# Altium PCB Stepper Board-v1.0.PcbDoc (part 1 of 8)
Units mil, origin at the board's own origin, x right, y up, seen from the top; angles counter-clockwise.
Board outline 6225.19 x 6531 mil, 4 copper layers (Top Layer, Layer-1, Layer-2, Bottom Layer), stack 61.654 mil thick; 410 components, 372 nets, 1464 pads, 1083 vias.
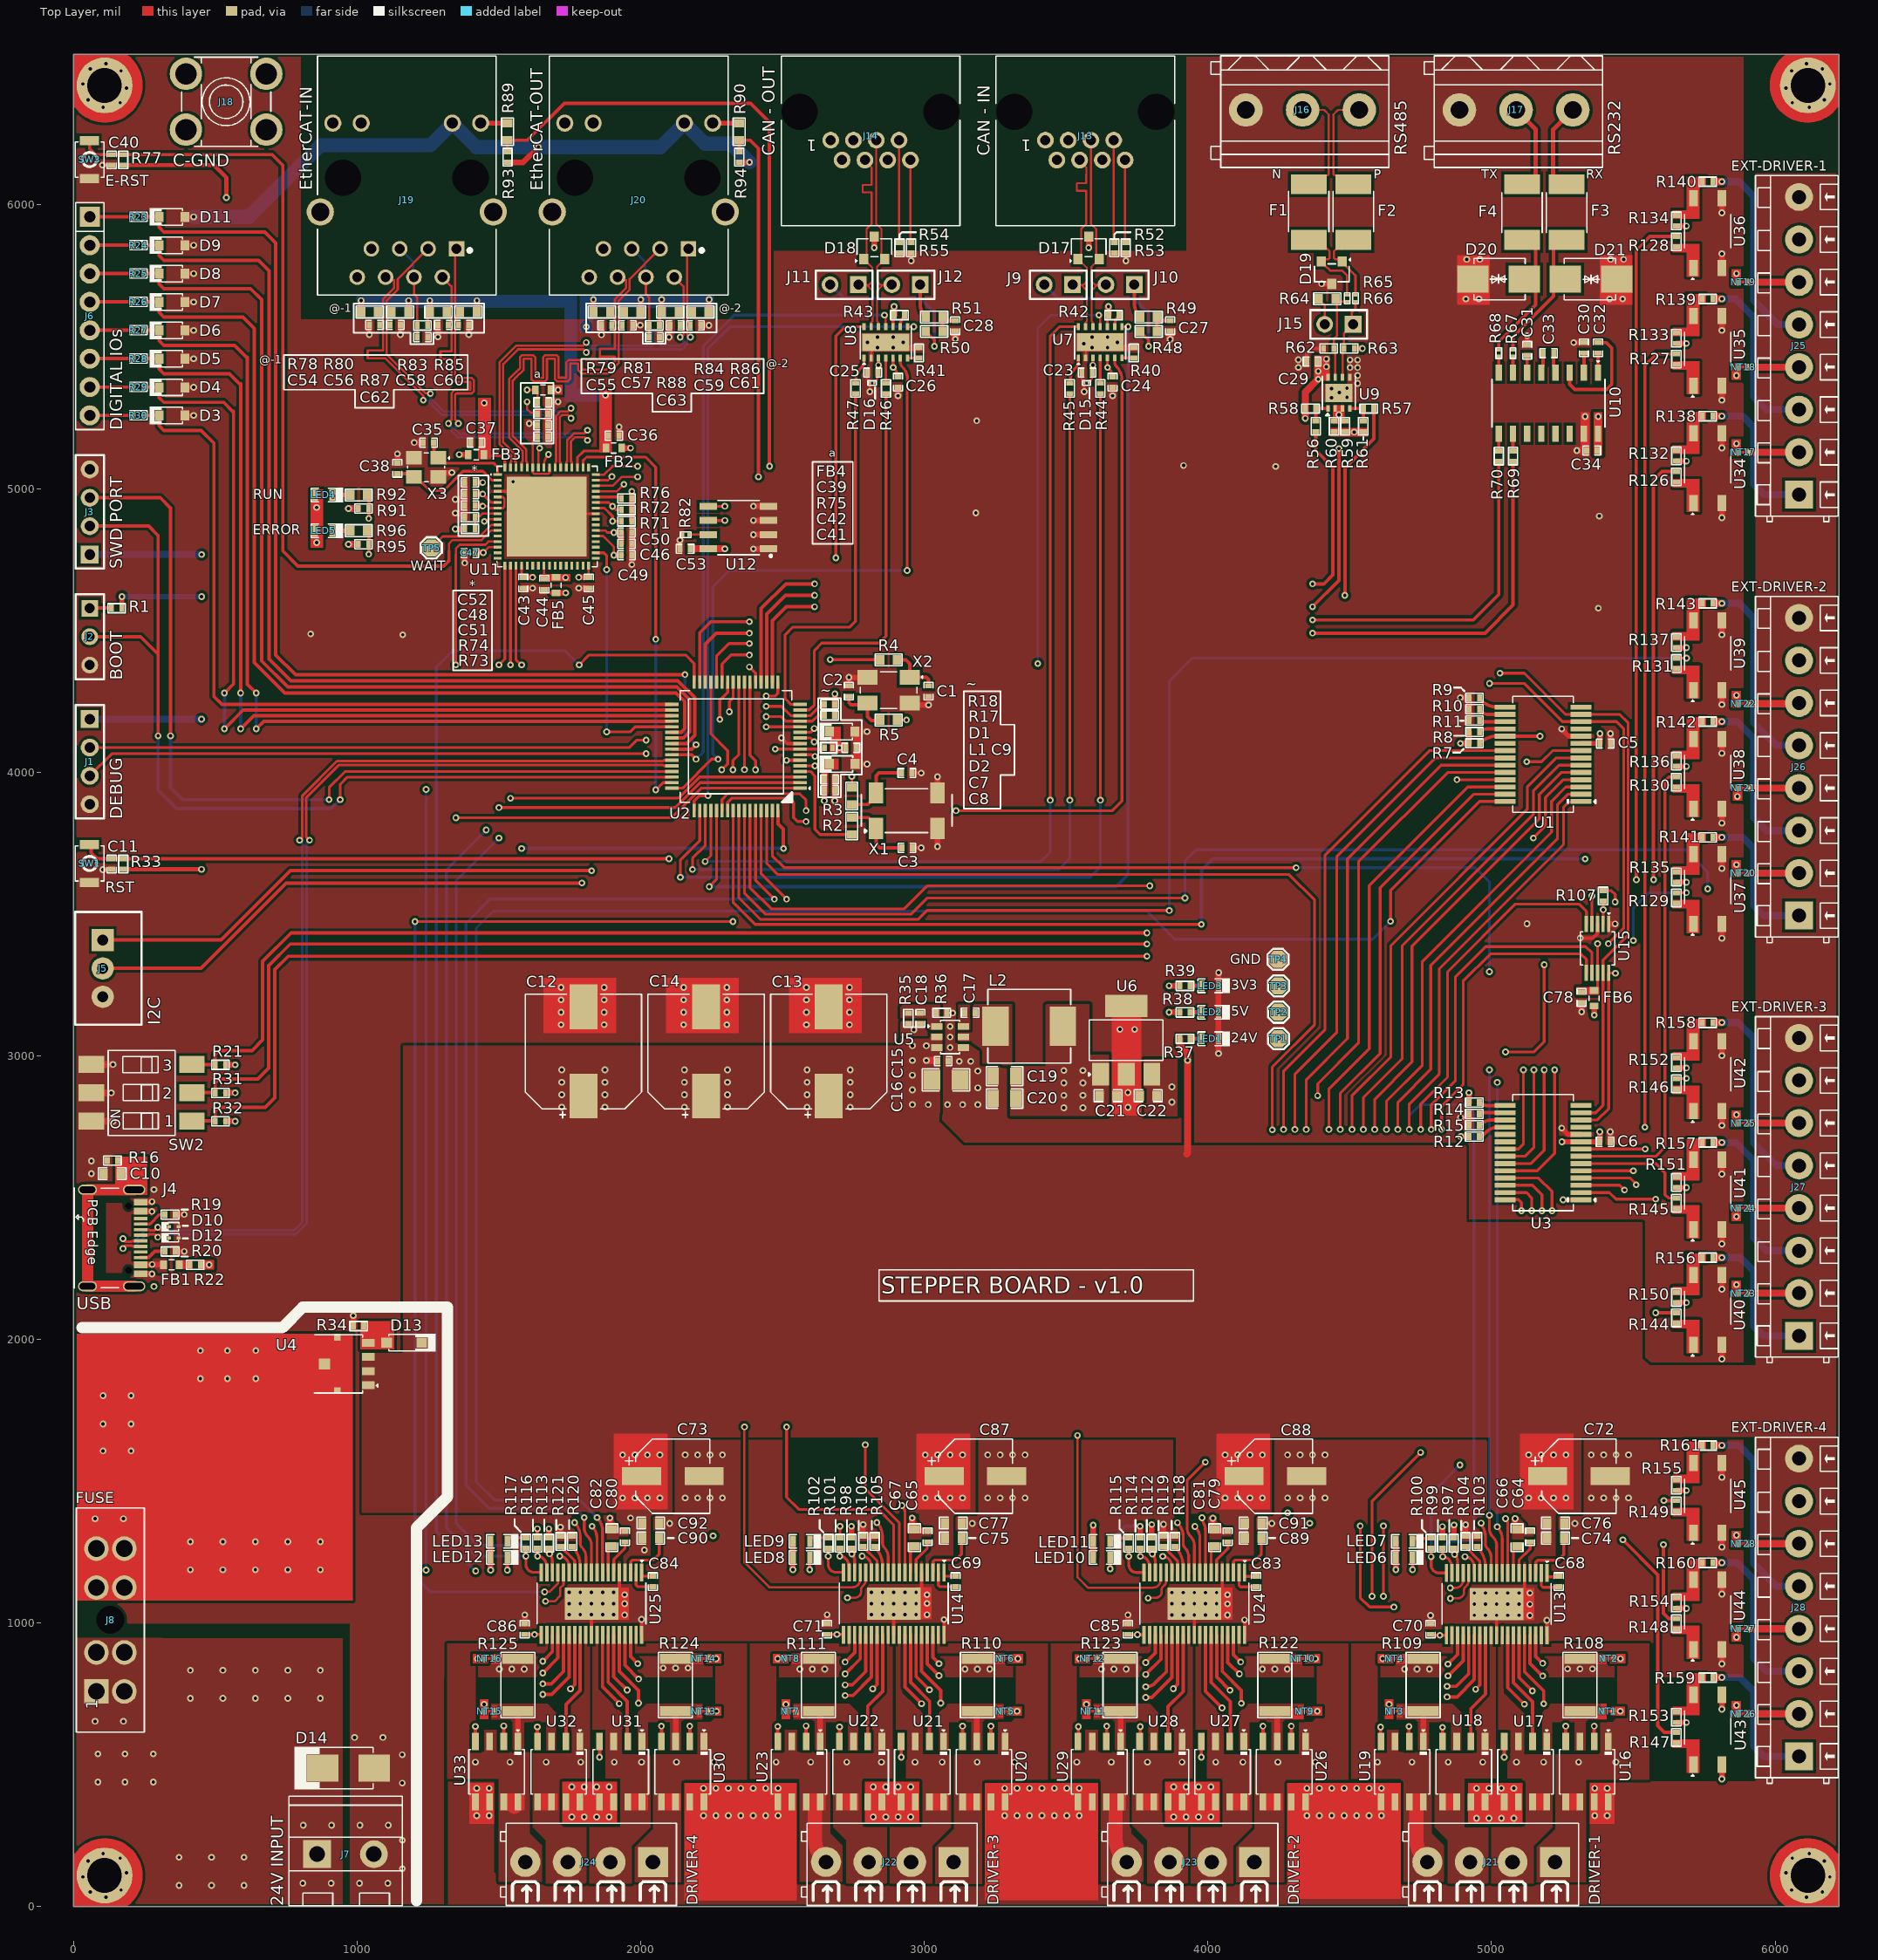
[diagram p0: Top Layer view]
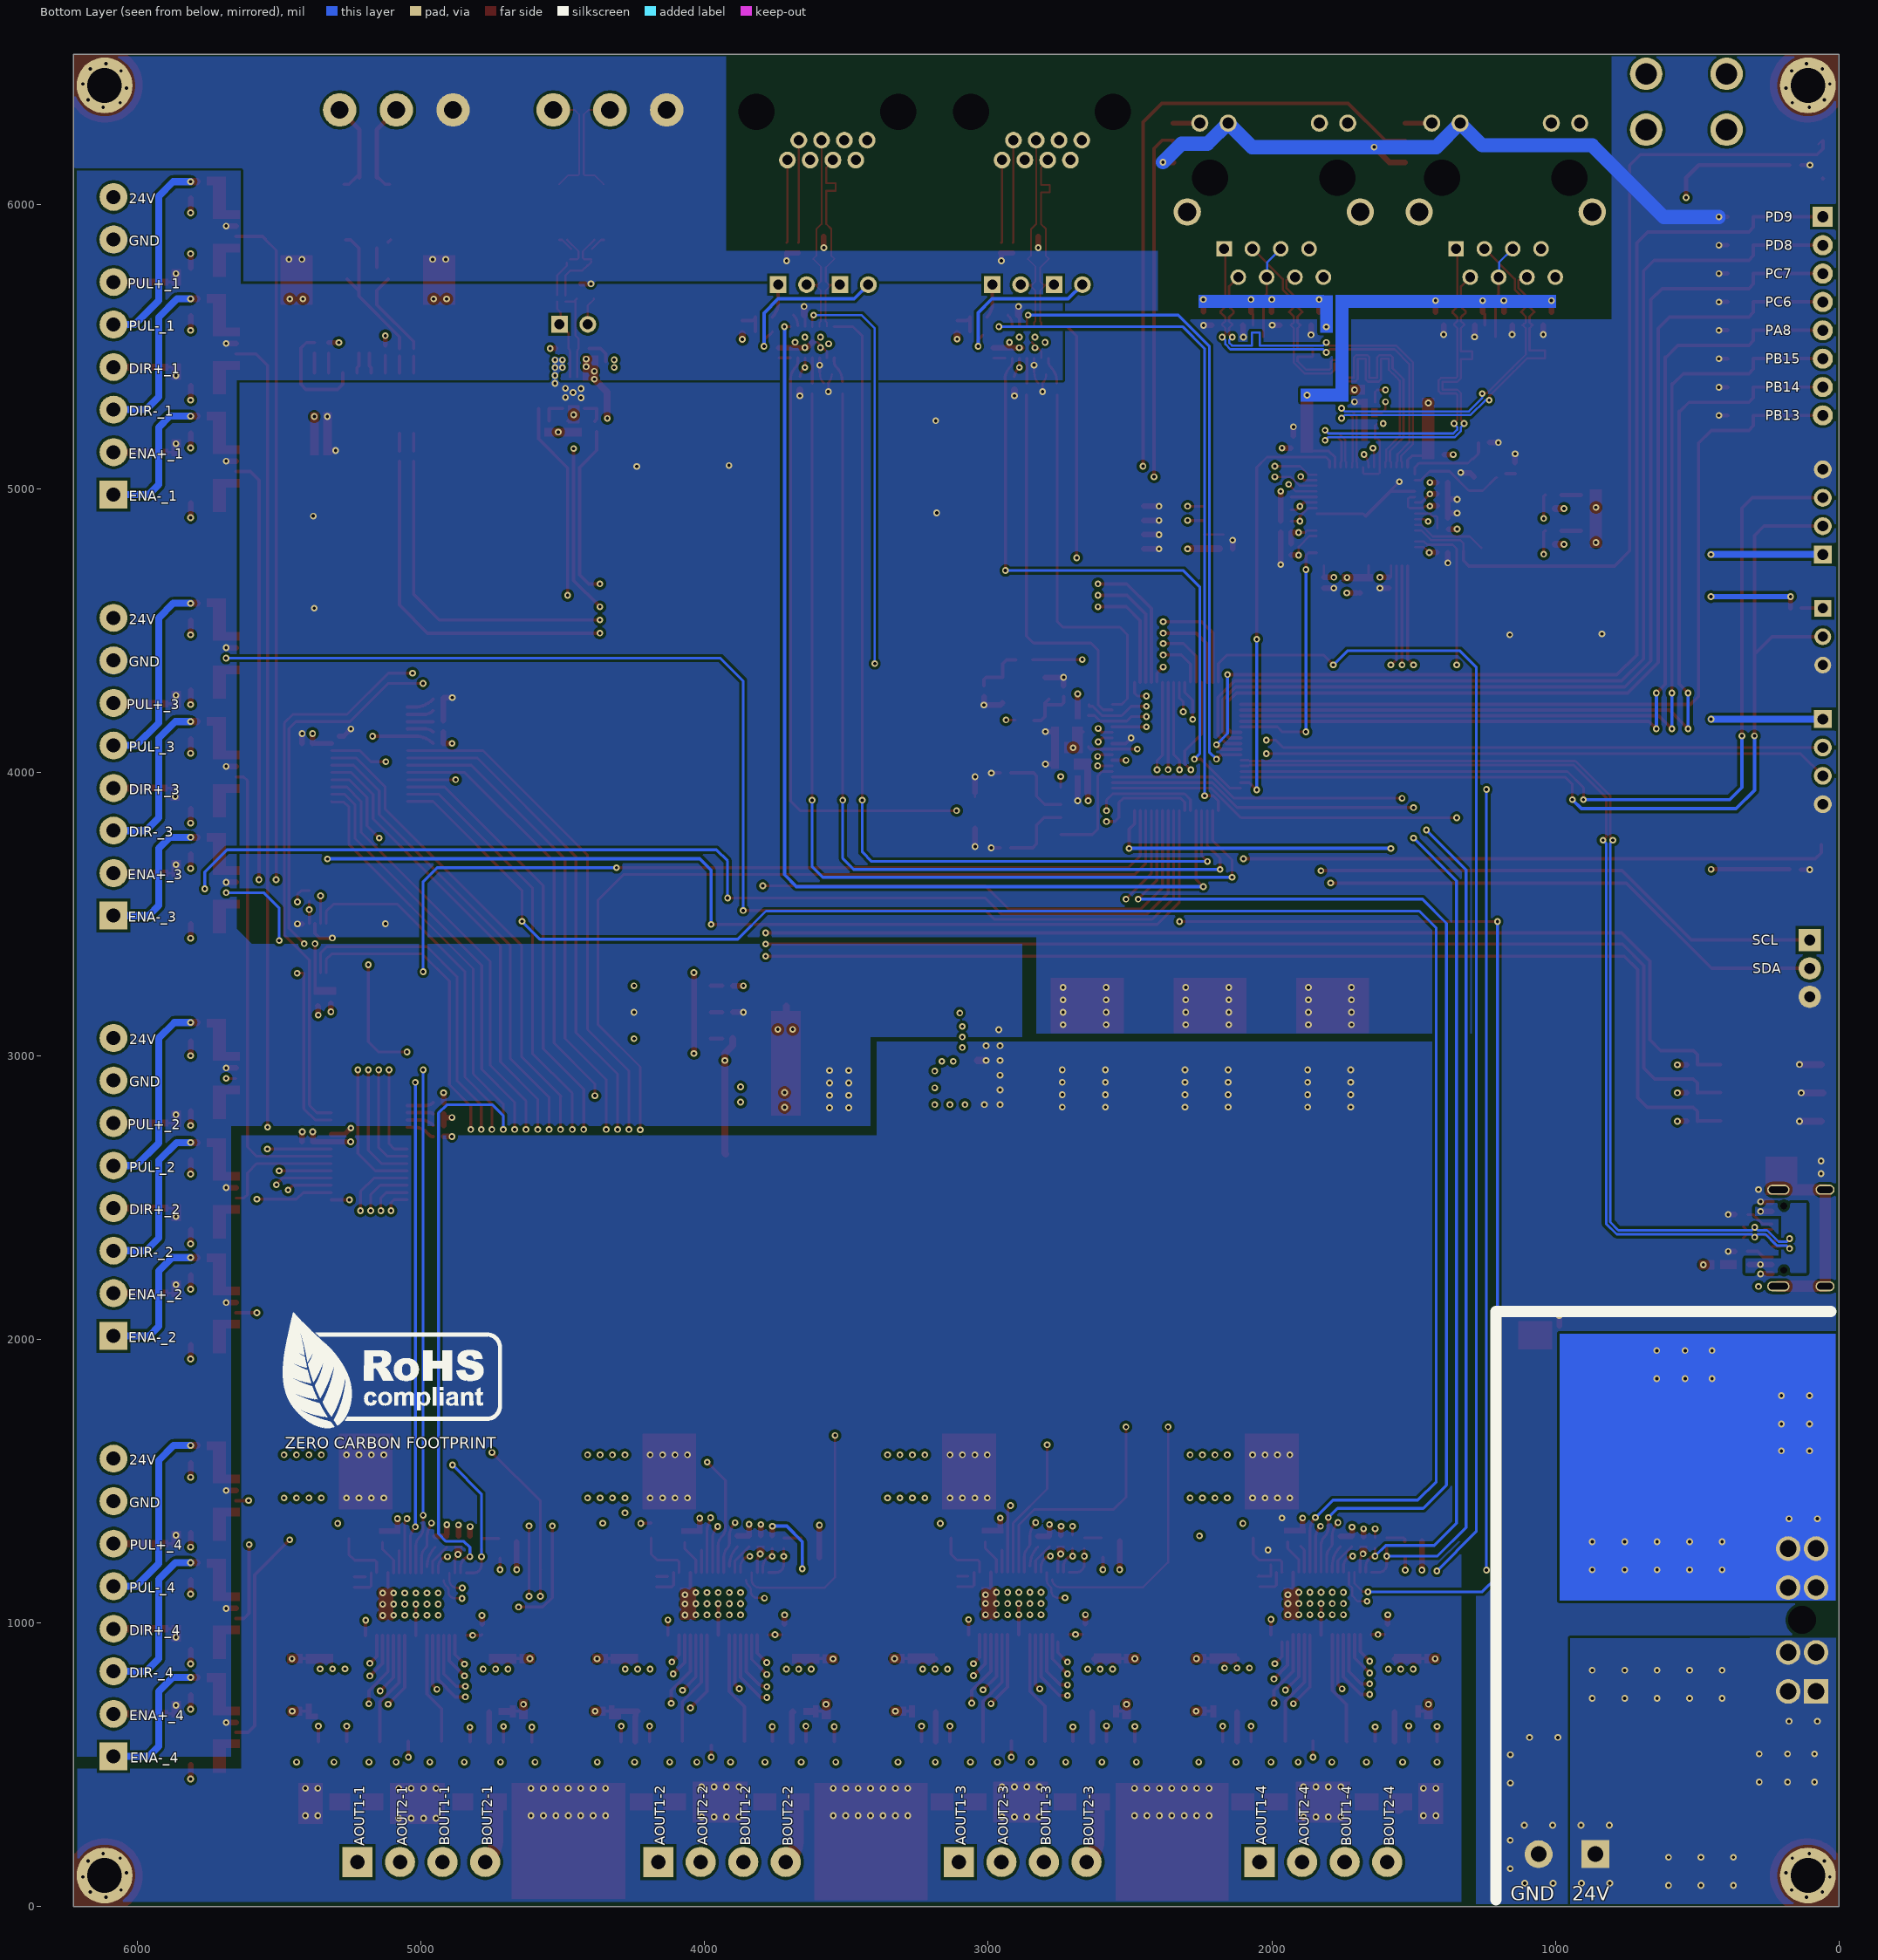
[diagram p1: Bottom Layer view, seen from below]
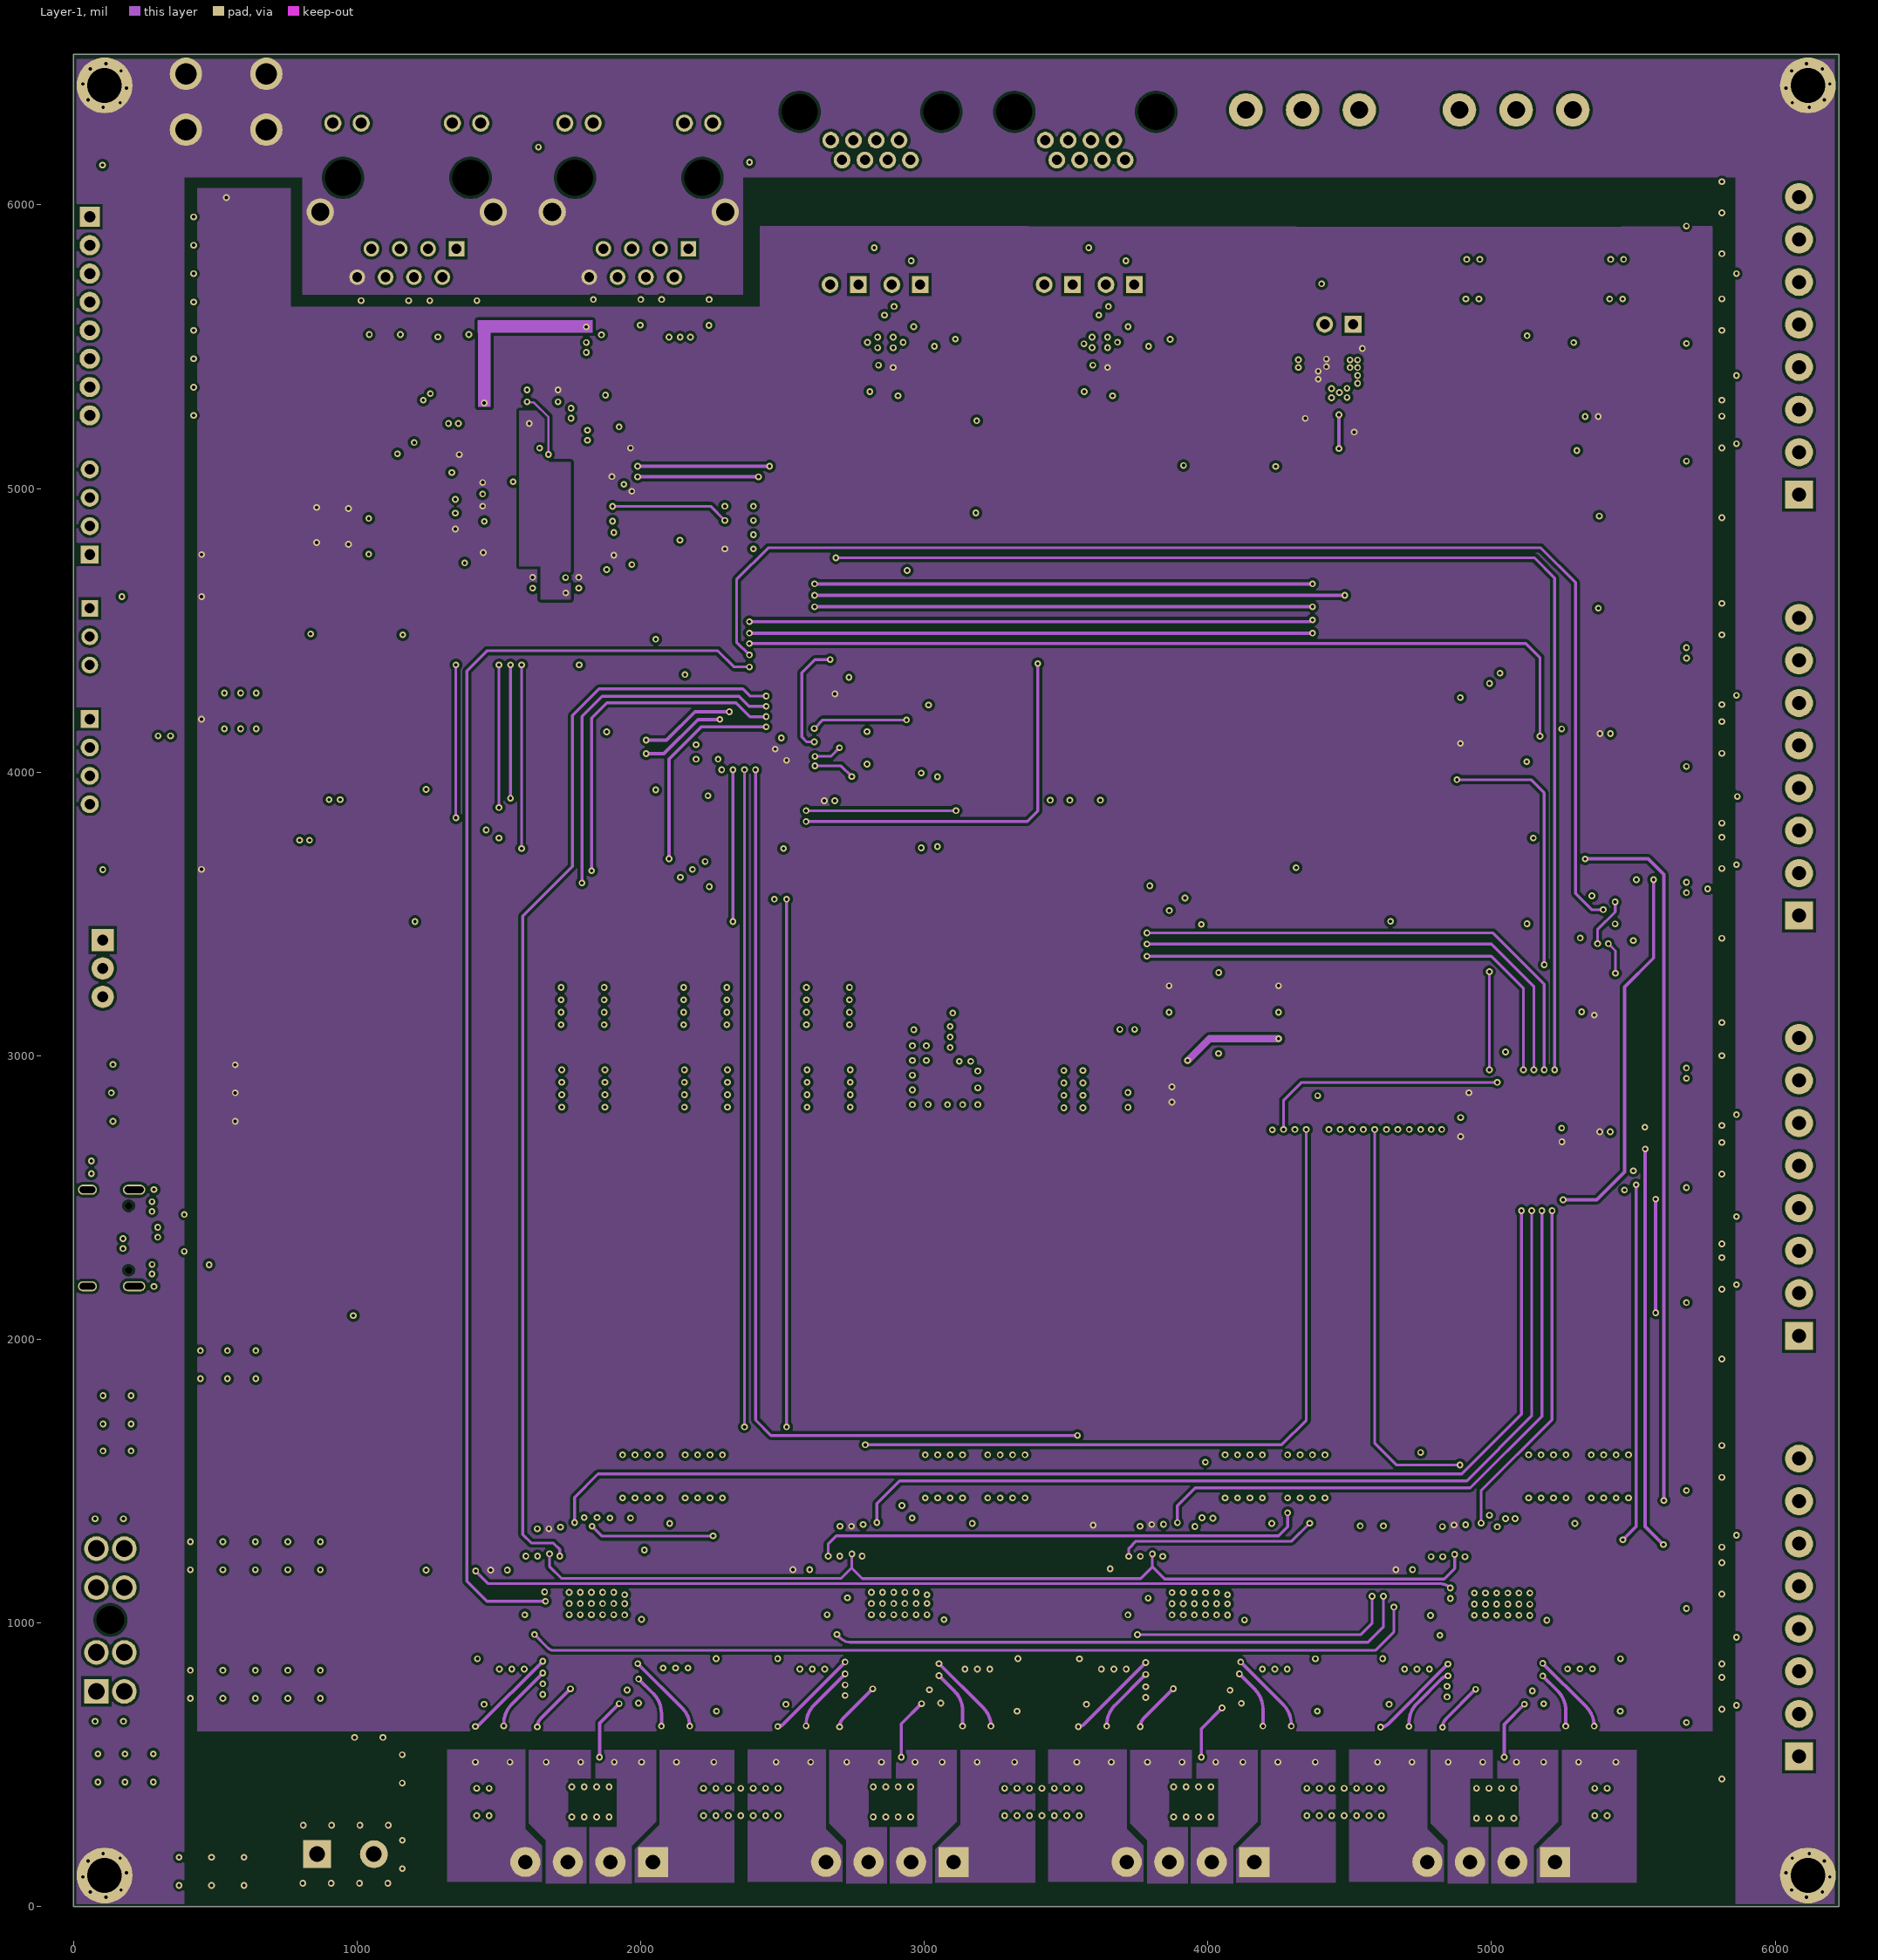
[diagram p2: Layer-1]
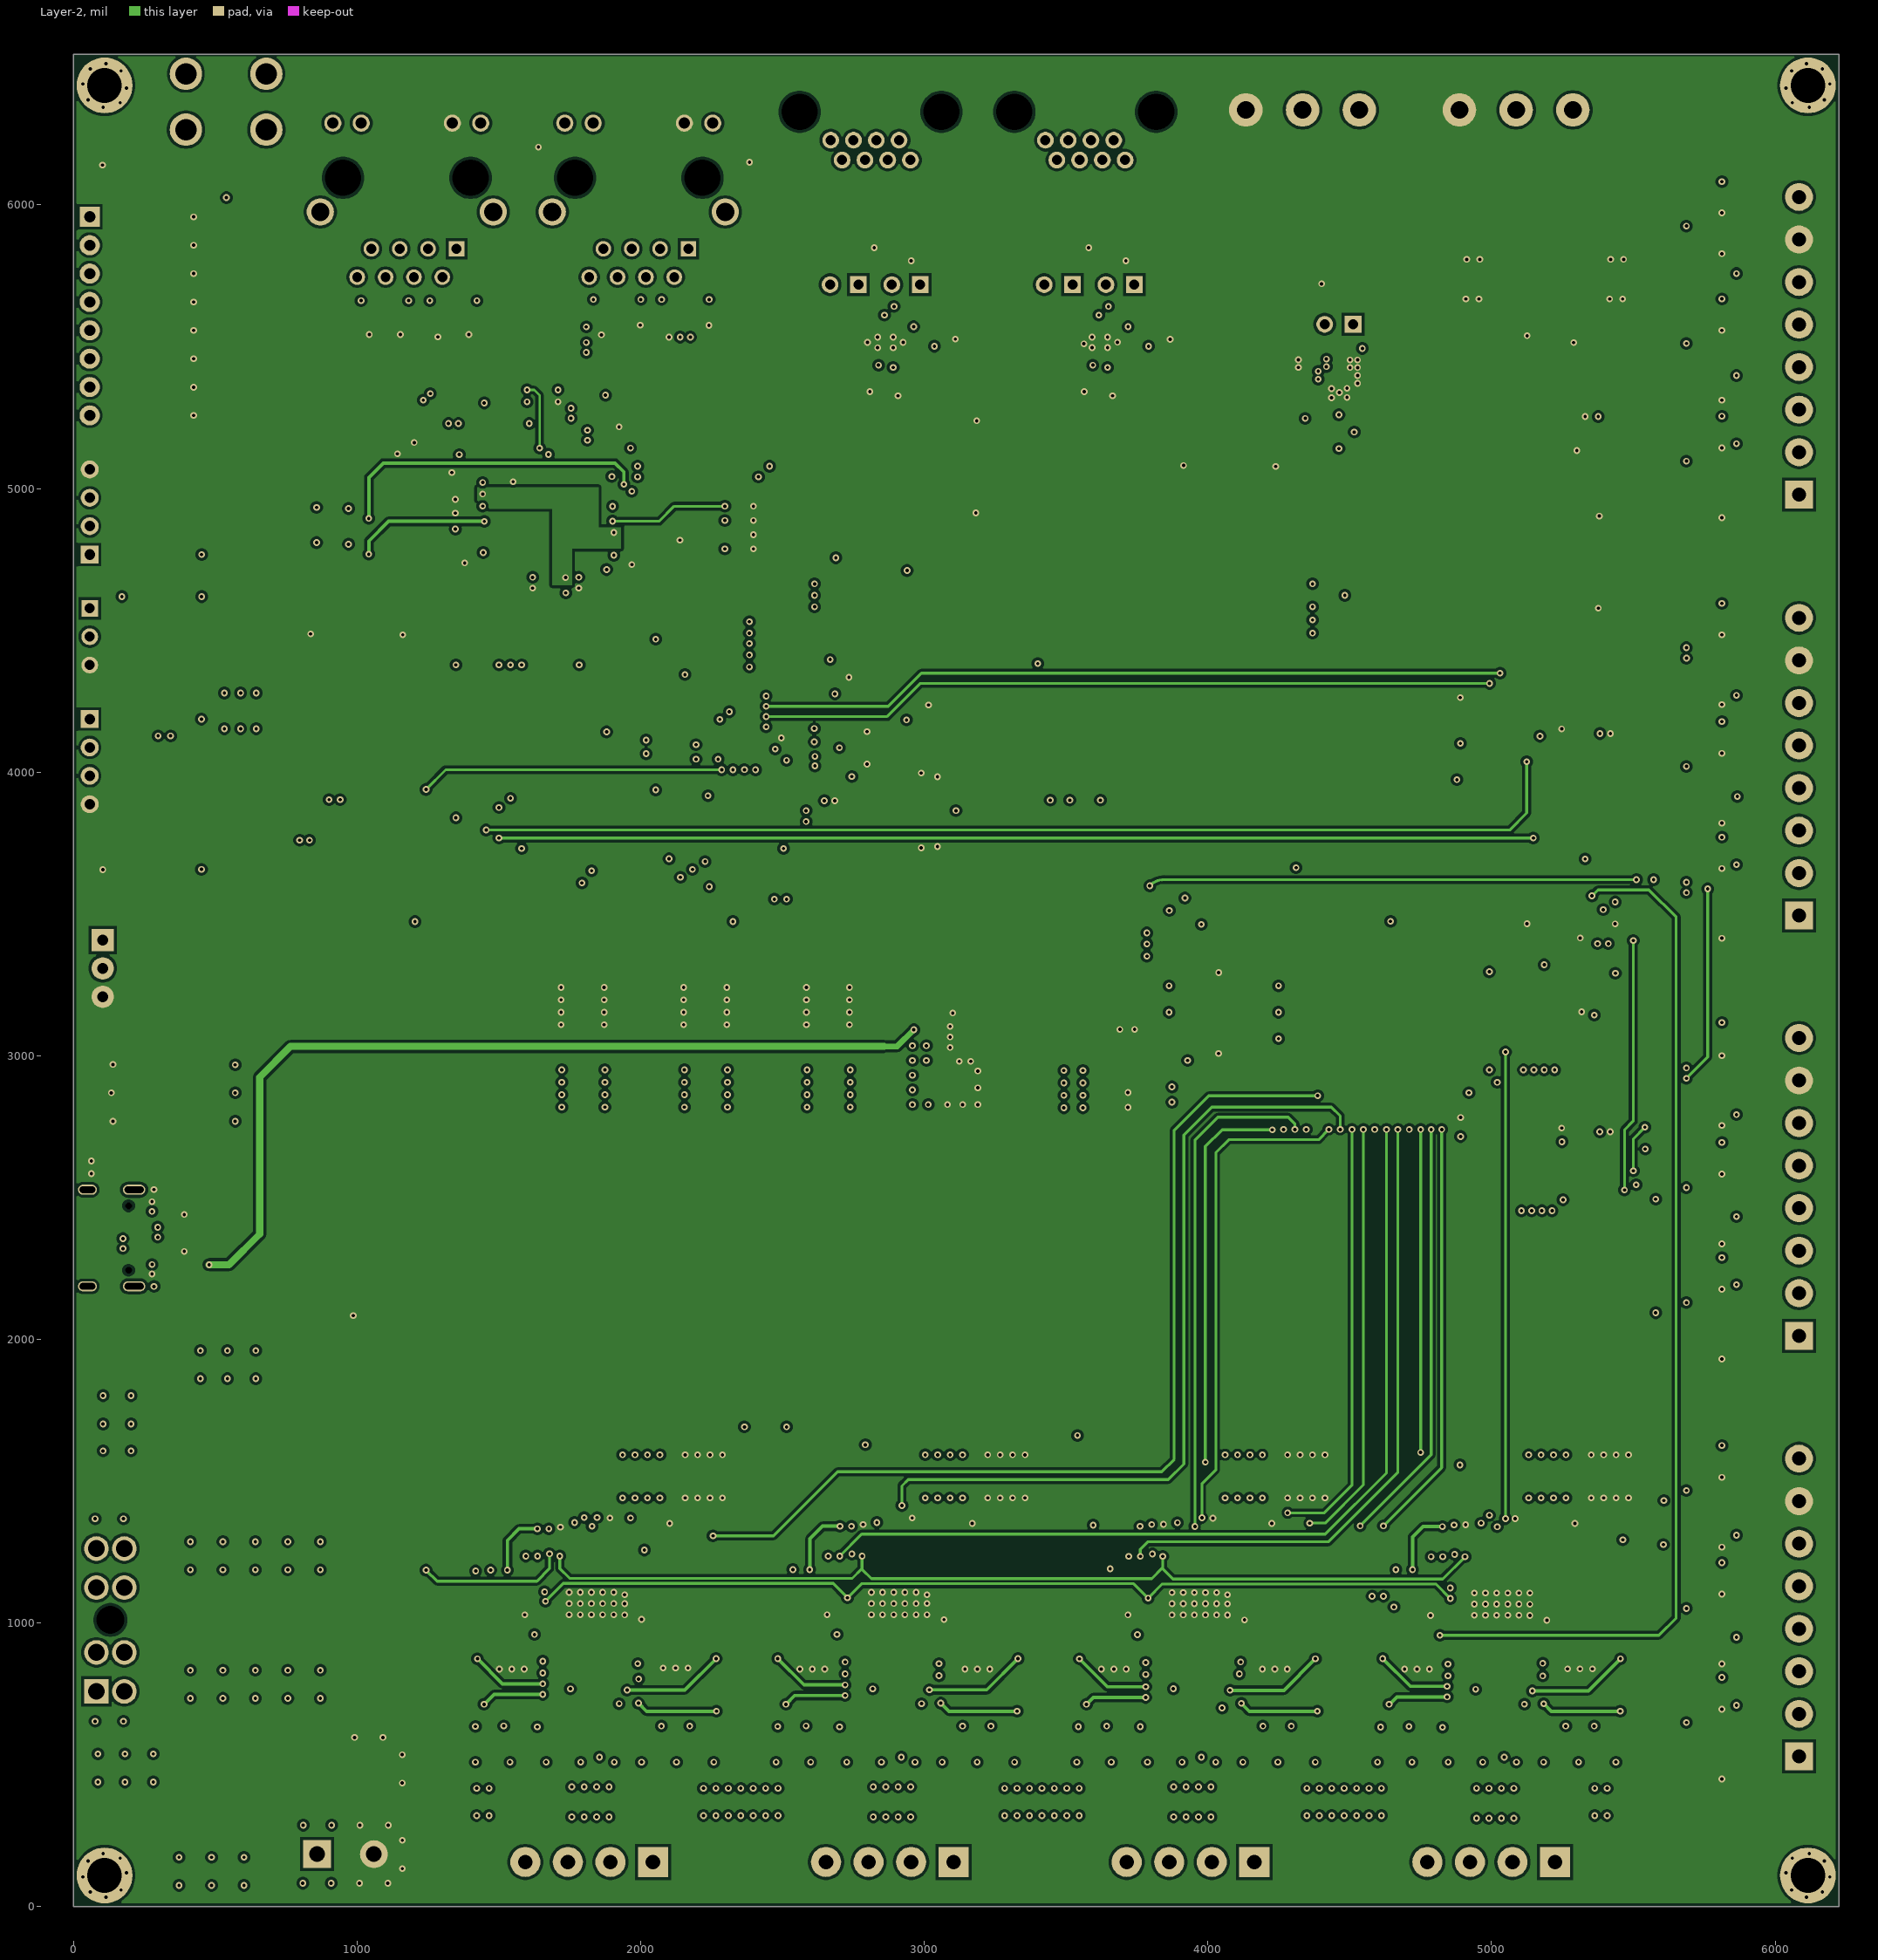
[diagram p3: Layer-2]
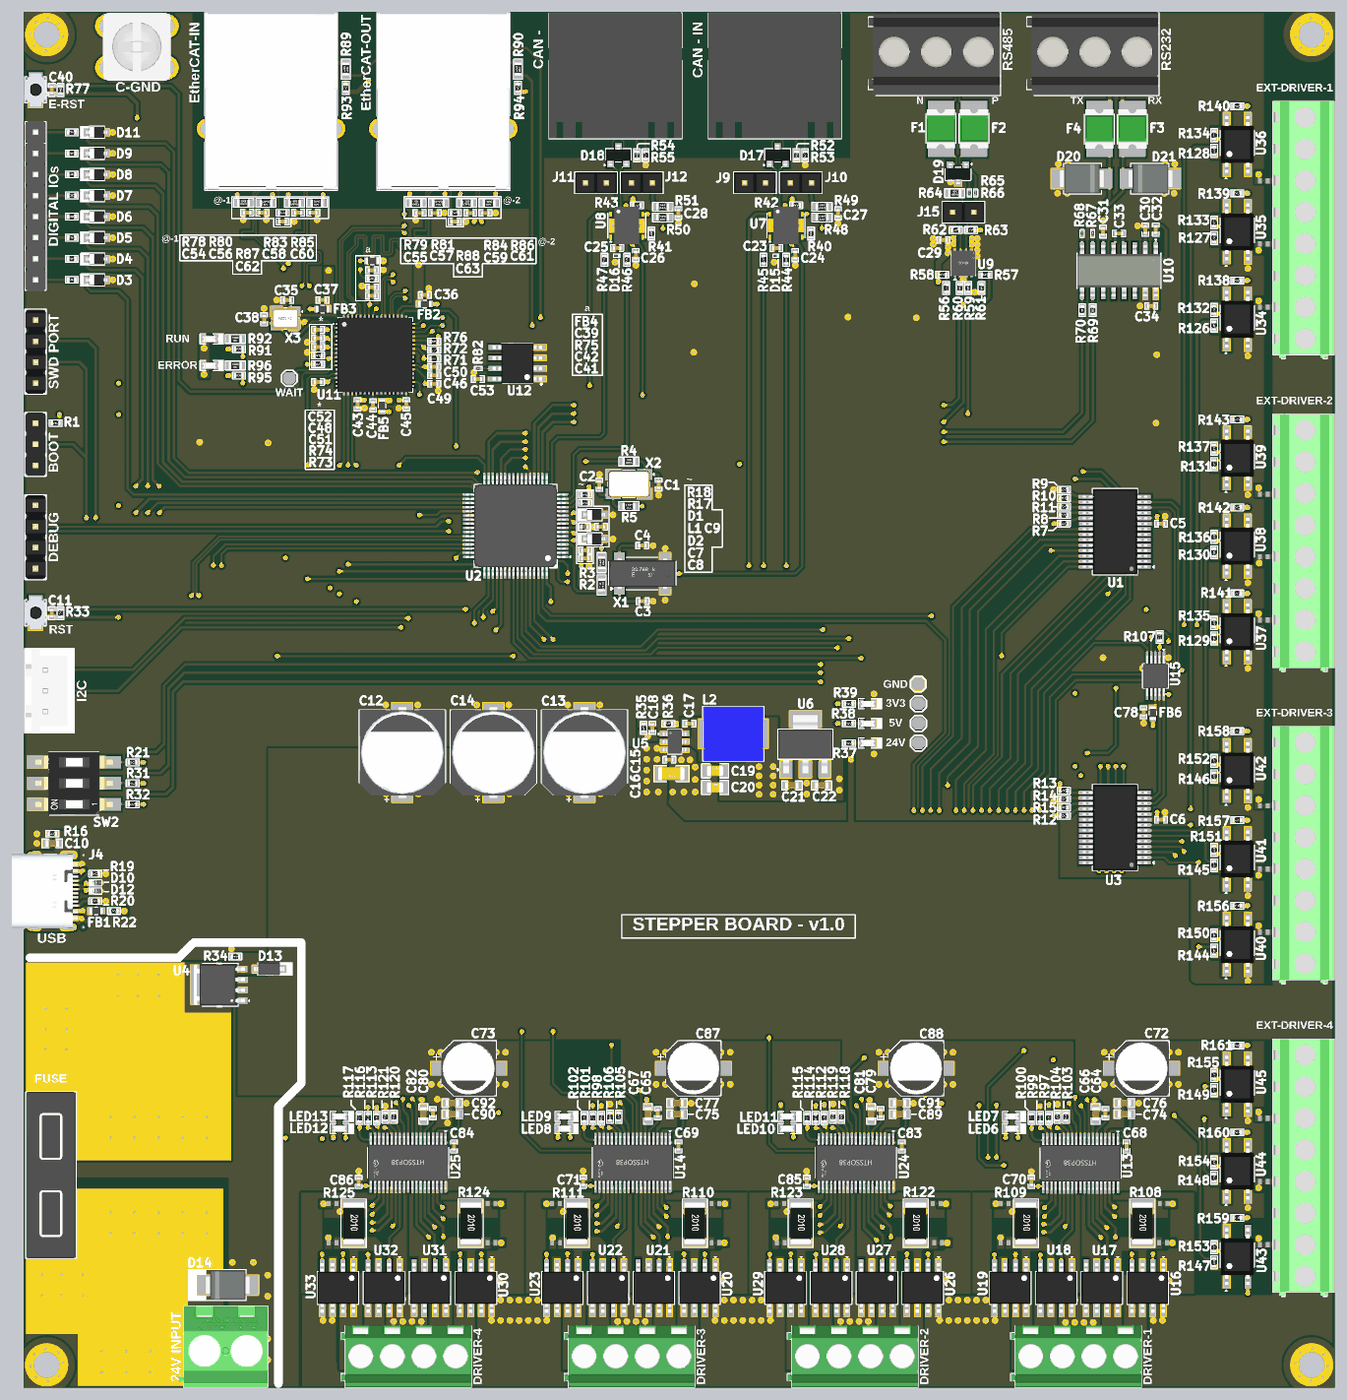
[diagram p8: 3D render of the assembled board from above, using the file's embedded part models]

## Layer stack, top to bottom
Top Solder: solder mask 0.3941, Solder Resist, Dk 3.5
Top Layer: signal copper 1.378
Dielectric 2: prepreg 7.9921, PP-006, Dk 4.1
Layer-1: signal copper 1.1811
Dielectric 1: core 40.5512, FR-4, Dk 4.8
Layer-2: signal copper 1.1811
Dielectric 3: prepreg 7.9921, PP-006, Dk 4.1
Bottom Layer: signal copper 1.378
Bottom Solder: solder mask 0.3941, Solder Resist, Dk 3.5

## Board outline
0,0 0,6531 6225.19,6531 6225.19,0

## Design rules (kind name [scope] priority, off if disabled: settings)
Clearance [All] p1: gap=10 ignorepadtopadclearanceinfootprint=FALSE except(4: Track-THPad SMDPad-THPad; 5: Arc-Arc Arc-Track Arc-SMDPad Track-Track Track-SMDPad SMDPad-SMDPad; 6: SMDPad-Hole THPad-THPad; 7: SMDPad-Fill Fill-Hole Poly-Hole; 8: Track-Via Track-Fill)
DiffPairsRouting DiffPairs_EtherCAT_A [InDifferentialPairClass('EtherCAT_A_Lines')] p1: maxlimit=5 minlimit=5 mostfreqgap=5 toplayer_minwidth=8 toplayer_maxwidth=8 toplayer_prefwidth=8 bottomlayer_minwidth=8 bottomlayer_maxwidth=8 bottomlayer_prefwidth=8 impedanceprofiledriven=TRUE impedanceprofileid={0CD5B6A0-DBDA-43A1-A0E0-57BB46686DC7} impedanceprofilevalue=100.000000 maxuncoupledlength=500
DiffPairsRouting DiffPairs_RS485 [InDifferentialPairClass('RS485_LINES')] p2: maxlimit=10 minlimit=5 mostfreqgap=10 toplayer_mingap=10 toplayer_minwidth=7.15 toplayer_maxwidth=7.15 toplayer_prefwidth=7.15 bottomlayer_mingap=10 bottomlayer_minwidth=7.15 bottomlayer_maxwidth=7.15 bottomlayer_prefwidth=7.15 impedanceprofiledriven=TRUE impedanceprofileid={4009BA99-3828-47EA-8B32-7156EF19E21D} impedanceprofilevalue=120.000000 maxuncoupledlength=500
DiffPairsRouting DiffPairs_CAN [InDifferentialPairClass('CAN_Lines')] p3: maxlimit=10 minlimit=5 mostfreqgap=10 toplayer_mingap=10 toplayer_minwidth=7.15 toplayer_maxwidth=7.15 toplayer_prefwidth=7.15 bottomlayer_mingap=10 bottomlayer_minwidth=7.15 bottomlayer_maxwidth=7.15 bottomlayer_prefwidth=7.15 impedanceprofiledriven=TRUE impedanceprofileid={4009BA99-3828-47EA-8B32-7156EF19E21D} impedanceprofilevalue=120.000000 maxuncoupledlength=500
DiffPairsRouting DiffPairs_USB [InDifferentialPairClass('USB_PROGRAM_LINES')] p4: maxlimit=5 minlimit=5 mostfreqgap=5 toplayer_minwidth=10 toplayer_maxwidth=10 toplayer_prefwidth=10 bottomlayer_minwidth=10 bottomlayer_maxwidth=10 bottomlayer_prefwidth=10 impedanceprofiledriven=TRUE impedanceprofileid={01BCDA98-5351-4582-931E-7B882E7855C9} impedanceprofilevalue=90.000000 maxuncoupledlength=500
HoleSize [All] p1: absolutevalues=TRUE maxlimit=1000 minlimit=1 maxpercent=80.000 minpercent=20.000
HoleToHoleClearance [All] p1: gap=1 allowstackedmicrovias=TRUE
MatchedLengths "Schematic Matched Net Lengths" [InNetClass('CAN')] p1: tolerance=20 checknetsindiffpair=TRUE checkdiffpairvsdiffpair=FALSE checkxsignals=FALSE checkothers=FALSE
MatchedLengths "Schematic Matched Net Lengths_5" [InNetClass('USB_PROGRAM')] p2: tolerance=50 checknetsindiffpair=TRUE checkdiffpairvsdiffpair=FALSE checkxsignals=FALSE checkothers=FALSE
MatchedLengths "Schematic Matched Net Lengths_4" [InNetClass('EtherCAT_A')] p3: tolerance=25.4 checknetsindiffpair=FALSE checkdiffpairvsdiffpair=TRUE checkxsignals=TRUE checkothers=TRUE
MatchedLengths "Schematic Matched Net Lengths_3" [InNetClass('RS485')] p4: tolerance=20 checknetsindiffpair=TRUE checkdiffpairvsdiffpair=FALSE checkxsignals=FALSE checkothers=FALSE
MaxMinImpedance "Schematic Impedance Constraint" [InNetClass('CAN')] p1: minimum=115.0 maximum=125.0
MaxMinImpedance "Schematic Impedance Constraint_5" [InNetClass('RS485')] p2: minimum=115.0 maximum=125.0
MaxMinImpedance "Schematic Impedance Constraint_4" [InNetClass('EtherCAT_A')] p3: minimum=95.00 maximum=105.0
MaxMinImpedance "Schematic Impedance Constraint_3" [InNetClass('USB_PROGRAM')] p4: minimum=85.00 maximum=90.00
MinimumSolderMaskSliver [All] p1: minsoldermaskwidth=0
PolygonConnect [All] p1: connectstyle=Direct reliefconductorwidth=10 reliefentries=4 polygonreliefangle="90 Angle" airgapwidth=10
RoutingVias [All] p1: holewidth=11.81 width=23.62 viastyle="Through Hole" minholewidth=11.81 minwidth=23.62 maxholewidth=11.81 maxwidth=23.62
SilkToSilkClearance [All] p1: silktosilkclearance=0
SilkToSolderMaskClearance [IsPad] p1: minsilkscreentomaskgap=0 clearancetoexposedcopper=TRUE
SolderMaskExpansion [All] p1: expansion=4 istentingtop=FALSE
UnRoutedNet [All] p1: checkbadconnections=TRUE
Width [All] p1: maxlimit=100 minlimit=6 preferedwidth=12 minimp=50.000000 maximp=50.000000 favimp=50.000000
23 further rules are at their usual default settings.

## Classes and differential pairs
differential pair class USB_PROGRAM_LINES: USB
differential pair class CAN_Lines: CAN1 CAN2
net class USB_PROGRAM: USB_N USB_P
differential pair class RS485_LINES: RS485
differential pair class EtherCAT_A_Lines: RXA RXB TXA TXB
net class RS485: RS485_N RS485_P
net class EtherCAT_A: RXA_N RXA_P RXB_N RXB_P TXA_N TXA_P TXB_N TXB_P
net class CAN: CAN1_N CAN1_P CAN2_N CAN2_P
component class U_RS485_RS232_Sheet: C29 C30 C31 C32 C33 C34 D19 D20 D21 F1 F2 F3 F4 J15 J16 J17 R56 R57 R58 R59 R60 R61 R62 R63 R64 R65 R66 R67 R68 R69 R70 U9 U10
component class U_EtherCAT_Sheet: C35 C36 C37 C38 C39 C40 C41 C42 C43 C44 C45 C46 C47 C48 C49 C50 C51 C52 C53 C54 C55 C56 C57 C58 C59 C60 C61 C62 C63 FB2 FB3 FB4 FB5 J18 J19 J20 LED4 LED5 R71 R72 R73 R74 R75 R76 R77 R78 R79 R80 R81 R82 R83 R84 R85 R86 R87 R88 R89 R90 R91 R92 R93 R94 R95 R96 SW3 TP5 U11 U12 X3
component class U_Power_Sheet: C12 C13 C14 C15 C16 C17 C18 C19 C20 C21 C22 D13 D14 J7 J8 L2 LED1 LED2 LED3 R34 R35 R36 R37 R38 R39 TP1 TP2 TP3 TP4 U4 U5 U6
component class U_Stepper_Driver_Sheet: C64 C65 C66 C67 C68 C69 C70 C71 C72 C73 C74 C75 C76 C77 C78 C79 C80 C81 C82 C83 C84 C85 C86 C87 C88 C89 C90 C91 C92 FB6 J21 J22 J23 J24 LED6 LED7 LED8 LED9 LED10 LED11 LED12 LED13 NT1 NT2 NT3 NT4 NT5 NT6 NT7 NT8 NT9 NT10 NT11 NT12 NT13 NT14 NT15 NT16 R97 R98 R99 R100 R101 R102 R103 R104 R105 R106 R107 R108 R109 R110 R111 R112 R113 R114 R115 R116 R117 R118 R119 R120 R121 R122 R123 R124 R125 U13 U14 U15 U16 U17 U18 U19 U20 U21 U22 U23 U24 U25 U26 U27 U28 U29 U30 U31 U32 U33
component class U_Ext_Stepper_Driver_Sheet: J25 J26 J27 J28 NT17 NT18 NT19 NT20 NT21 NT22 NT23 NT24 NT25 NT26 NT27 NT28 R126 R127 R128 R129 R130 R131 R132 R133 R134 R135 R136 R137 R138 R139 R140 R141 R142 R143 R144 R145 R146 R147 R148 R149 R150 R151 R152 R153 R154 R155 R156 R157 R158 R159 R160 R161 U34 U35 U36 U37 U38 U39 U40 U41 U42 U43 U44 U45
component class U_Controller_Sheet: C1 C2 C3 C4 C5 C6 C7 C8 C9 C10 C11 D1 D2 D3 D4 D5 D6 D7 D8 D9 D10 D11 D12 FB1 J1 J2 J3 J4 J5 J6 L1 R1 R2 R3 R4 R5 R7 R8 R9 R10 R11 R12 R13 R14 R15 R16 R17 R18 R19 R20 R21 R22 R23 R24 R25 R26 R27 R28 R29 R30 R31 R32 R33 SW1 SW2 U1 U2 U3 X1 X2
component class U_CAN_Sheet: C23 C24 C25 C26 C27 C28 D15 D16 D17 D18 J9 J10 J11 J12 J13 J14 R40 R41 R42 R43 R44 R45 R46 R47 R48 R49 R50 R51 R52 R53 R54 R55 U7 U8
differential pair CAN2: +CAN2_P -CAN2_N
differential pair CAN1: +CAN1_P -CAN1_N
differential pair USB: +USB_P -USB_N
differential pair TXB: +TXB_P -TXB_N
differential pair TXA: +TXA_P -TXA_N
differential pair RXB: +RXB_P -RXB_N
differential pair RXA: +RXA_P -RXA_N
differential pair RS485: +RS485_P -RS485_N

## Components (designator, comment, footprint, x,y, rotation, side; value= is the part's Value field where it differs from the comment)
C1 "30pF" Cap-0402 3015,4286 r90 top locked
C2 "30pF" Cap-0402 2734.06,4286 r270 top locked
C3 "DNP" Cap-0402 2939,3733 r180 top locked value=6.8pF
C4 "DNP" Cap-0402 2938,3997 r0 top locked value=6.8pF
C5 "100nF" Cap-0402 5400.83,4101.24 r180 top locked
C6 "100nF" Cap-0402 5400.39,2696.68 r180 top locked
C7 "4.7uF" Cap-0402 2666,3975.11 r180 top locked
C8 "100nF" Cap-0402 2666,3936.11 r180 top locked
C9 "0.1uF" cap-0402 2741,4086 r180 top locked value=100nF
C10 "4.7nF" Cap-0603 136,2584 r0 top locked
C11 "0.1uF" Cap-0402 134,3676 r90 top locked value=100nF
C12 "220uF" UCD-220uF-10mmDia 1798,3015 r90 top locked
C13 "220uF" UCD-220uF-10mmDia 2663,3015 r90 top locked
C14 "220uF" UCD-220uF-10mmDia 2230.5,3015 r90 top locked
C15 "10uF" Cap-1206 3076.03,2915.01 r180 top locked
C16 "100nF" cap-0402 3066.03,2981.01 r180 top locked
C17 "0.1uF" Cap-0402 3161.03,3152.01 r180 top locked
C18 "47pF" Cap-0402 2986.03,3132.01 r270 top locked
C19 "22uF" Cap-0805 3283.03,2928.01 r0 top locked
C20 "22uF" Cap-0805 3283.03,2849.01 r0 top locked
C21 "4.7uF" Cap-0603 3648.03,2859.01 r180 top locked
C22 "4.7uF" Cap-0603 3789.06,2859.01 r0 top locked
C23 "0.1uf" Cap-0402 3574,5408.69 r180 top locked value=100nF
C24 "0.1uf" Cap-0402 3664,5375.27 r90 top locked value=100nF
C25 "0.1uf" Cap-0402 2818,5408.69 r180 top locked value=100nF
C26 "0.1uf" Cap-0402 2907.19,5375.27 r90 top locked value=100nF
C27 "4.7nF" Cap-0402 3867,5574 r270 top locked
C28 "4.7nF" Cap-0402 3109,5574 r270 top locked
C29 "0.1uf" Cap-0402 4366.76,5447.24 r0 top locked
C30 "0.1uf" cap-0402 5325.76,5496.24 r270 top locked
C31 "0.1uf" Cap-0402 5125.76,5487.58 r270 top locked
C32 "0.1uf" cap-0402 5375.76,5496.24 r90 top locked
C33 "0.1uf" cap-0402 5200.76,5477.74 r180 top locked
C34 "0.1uf" Cap-0402 5353.76,5134.24 r0 top locked
C35 "30pF" Cap-0402 1251.25,5162.21 r0 top locked
C36 "100nF" cap-0402 1905,5186 r180 top locked
C37 "100nF" Cap-0402 1419.1,5162.35 r0 top locked
C38 "30pF" Cap-0402 1141.89,5071.21 r270 top locked
C39 "100nF" Cap-0402 1654,5304 r180 top locked
C40 "100nF" cap-0402 134,6159 r90 top locked
C41 "100nF" Cap-0402 1654,5183 r180 top locked
C42 "100nF" cap-0402 1654,5223 r180 top locked
C43 "100nF" cap-0402 1585.55,4667.52 r90 top locked
C44 "1uF" Cap-0402 1659.55,4662.52 r90 top locked
C45 "100nF" Cap-0402 1816.55,4667.52 r90 top locked
C46 "470pF" Cap-0402 1950,4805 r180 top locked
C47 "100nF" cap-0402 1397.55,4773 r0 top locked
C48 "100nF" Cap-0402 1397.55,4980.72 r0 top locked
C49 "100nF" cap-0402 1950,4765 r180 top locked
C50 "100nF" cap-0402 1950,4845 r180 top locked
C51 "100nF" Cap-0402 1397.55,4939.92 r0 top locked
C52 "100nF" Cap-0402 1397.55,5021.52 r0 top locked
C53 "100nF" Cap-0402 2156.56,4787.52 r0 top locked
C54 "10pF" cap-0402 1061.31,5576.67 r0 top locked
C55 "10pF" Cap-0402 1880,5575.55 r0 top locked
C56 "10pF" Cap-0402 1134.05,5576.68 r180 top locked
C57 "10pF" Cap-0402 1952.74,5575.55 r180 top locked
C58 "10pF" Cap-0402 1303.31,5576.68 r0 top locked
C59 "10pF" Cap-0402 2121,5575.55 r0 top locked
C60 "10pF" Cap-0402 1375.31,5576.68 r180 top locked
C61 "10pF" Cap-0402 2193,5575.55 r180 top locked
C62 "22nF" Cap-0402 1230,5534.32 r180 top locked
C63 "22nF" Cap-0402 2047.69,5534.32 r180 top locked
C64 "100nF" Cap-0402 5136.23,1304.13 r90 top locked
C65 "100nF" Cap-0402 3011.23,1304.13 r90 top locked
C66 "1uF" Cap-0603 5090.05,1300.13 r270 top locked
C67 "1uF" Cap-0603 2965.05,1300.13 r270 top locked
C68 "100nF" Cap-0402 5237,1146 r90 top locked
C69 "100nF" Cap-0402 3110,1146 r90 top locked
C70 "1nF" Cap-0402 4785,978 r90 top locked
C71 "1nF" Cap-0402 2657,978 r90 top locked
C72 "100uF" RVT1H101M0607 5308.24,1517 r0 top locked
C73 "100uF" RVT1H101M0607 2113.24,1517 r0 top locked
C74 "1uF" Cap-0603 5226.13,1299 r180 top locked
C75 "1uF" Cap-0603 3102.13,1299 r180 top locked
C76 "1uF" Cap-0603 5226.13,1352 r180 top locked
C77 "1uF" Cap-0603 3102.13,1352 r180 top locked
C78 "100nF" cap-0402 5317.79,3205.62 r270 top locked
C79 "100nF" cap-0402 4069.65,1304.13 r90 top locked
C80 "100nF" Cap-0402 1944.23,1304.13 r90 top locked
C81 "1uF" Cap-0603 4023.47,1300.13 r270 top locked
C82 "1uF" Cap-0603 1898.04,1300.13 r270 top locked
C83 "100nF" cap-0402 4170,1146 r90 top locked
C84 "100nF" cap-0402 2043.13,1146 r90 top locked
C85 "1nF" Cap-0402 3718,978 r90 top locked
C86 "1nF" cap-0402 1591,978 r90 top locked
C87 "100uF" RVT1H101M0607 3180.24,1517 r0 top locked
C88 "100uF" RVT1H101M0607 4237.66,1517 r0 top locked
C89 "1uF" Cap-0603 4159.56,1299 r180 top locked
C90 "1uF" Cap-0603 2035.13,1299 r180 top locked
C91 "1uF" Cap-0603 4159.56,1352 r180 top locked
C92 "1uF" Cap-0603 2035.13,1352 r180 top locked
D1 "SD03" SOD-323 2710,4143 r0 top locked
D2 "SD03" SOD-323 2710.03,4028.48 r0 top locked
D3 "MM3Z3V3" SOD-323 347,5258 r0 top locked
D4 "MM3Z3V3" SOD-323 346.98,5357 r0 top locked
D5 "MM3Z3V3" SOD-323 346.99,5458 r0 top locked
D6 "MM3Z3V3" SOD-323 346.99,5558 r0 top locked
D7 "MM3Z3V3" SOD-323 346.99,5658 r0 top locked
D8 "MM3Z3V3" SOD-323 346.99,5758 r0 top locked
D9 "MM3Z3V3" SOD-323 346.99,5858 r0 top locked
D10 "ESD9L5.0ST5G" SOD-923. 353.37,2397 r0 top locked
D11 "MM3Z3V3" SOD-323 346.99,5958 r0 top locked
D12 "ESD9L5.0ST5G" SOD-923. 353.35,2358 r0 top locked
D13 "BZT52C16" SOD-123 1166,1988 r0 top locked
D14 "SMBJ28A-13-F" SMB_ 969.32,488 r180 top locked value=330pF
D15 "PESD5V0H1BSFYL" DSN0603-2 3571.6,5372.05 r180 top locked
D16 "PESD5V0H1BSFYL" DSN0603-2 2816,5372.05 r180 top locked
D17 "CDSOT23-T24CAN-Q" SOT-23 3579.65,5848.98 r0 top locked
D18 "CDSOT23-T24CAN-Q" SOT-23 2823.51,5848.98 r0 top locked
D19 "SM712" SOT-23 4436.76,5761.24 r180 top locked
D20 "SMBJ8.0CA" "SMB Bi Directional" 5024.76,5738.24 r0 top locked
D21 "SMBJ8.0CA" "SMB Bi Directional" 5350.76,5738.24 r180 top locked
F1 "MF-MSMF010-2" Fuse-1812_ 4355.76,5974.95 r90 top locked
F2 "MF-MSMF010-2" Fuse-1812_ 4512.76,5974.95 r90 top locked
F3 "MF-MSMF010-2" Fuse-1812_ 5264.76,5974.95 r270 top locked
F4 "MF-MSMF010-2" Fuse-1812_ 5107.76,5974.95 r270 top locked
FB1 "BLM18PG221SN1D" "IND-0603 (1608 Metric)" 345,2263 r0 top locked value=100mR
FB2 "BLM18PG221SN1D" "IND-0603 (1608 Metric)" 1905,5143 r180 top locked value=100mR
FB3 "BLM18PG221SN1D" "IND-0603 (1608 Metric)" 1419.1,5119.35 r0 top locked value=100mR
FB4 "BLM18PG221SN1D" "IND-0603 (1608 Metric)" 1656,5348 r180 top locked value=100mR
FB5 "BLM18PG221SN1D" "IND-0603 (1608 Metric)" 1701.55,4659.52 r270 top locked value=100mR
FB6 "BLM18PG221SN1D" "IND-0603 (1608 Metric)" 5361.79,3202.62 r270 top locked value=100mR
J1 "X6511WV-04H-C60D30" HDR1X4_ 57,4187 r270 top locked
J2 "68000-103HLF" HDR1X3_ 57,4577.53 r270 top locked
J3 "X6511WV-04H-C60D30" HDR1X4_ 57,4767.53 r90 top locked
J4 "TYPE-C-31-M-12" TYPE-C-31-M-12_ 142.5,2357.28 r270 top locked
J5 "B3B-XH-A(LF)(SN)" B3B-XH-A(LF)(SN)_ 103,3258 r270 top locked
J6 "X6511WV-08H-C60D30" "HDR 1x8 TH male" 57,5608 r270 top locked
J7 "1715721" 1715721 959.02,184.51 r0 top locked
J8 "178.6165.0002" 178.6165.0002 129.79,1010.17 r90 top
J9 "X6511WV-02H-C60D30" HDR1X2_ 3522.64,5718.98 r180 top locked
J10 "X6511WV-02H-C60D30" HDR1X2_ 3740.51,5718.98 r180 top locked
J11 "X6511WV-02H-C60D30" HDR1X2_ 2767.64,5718.98 r180 top locked
J12 "X6511WV-02H-C60D30" HDR1X2_ 2985.51,5718.98 r180 top locked
J13 "X12ADIWA3DY1027" X12ADIWA3DY1027 3567.49,6243.47 r180 top locked
J14 "X12ADIWA3DY1027" X12ADIWA3DY1027 2810.49,6243.47 r180 top locked
J15 "X6511WV-02H-C60D30" HDR1X2_ 4511.75,5579.24 r180 top locked
J16 "DB128L-5.08-3P-BK-S" DB128L-5.08-3P-BK-S 4333.76,6335.24 r180 top
J17 "DB128L-5.08-3P-BK-S" DB128L-5.08-3P-BK-S 5086.76,6335.24 r180 top
J18 "T44001" T44001 538,6364 r270 top locked
J19 "HR911105A" HR911105A 1175.02,6016.97 r0 top locked
J20 "HR911105A" HR911105A 1993,6016.97 r0 top locked
J21 "DB125-3.81-4P-GN-S" DB125-3.81-4P-GN-S 4999,157 r180 top locked
J22 "DB125-3.81-4P-GN-S" DB125-3.81-4P-GN-S 2878.33,157 r180 top locked
J23 "DB125-3.81-4P-GN-S" DB125-3.81-4P-GN-S 3938.67,157 r180 top locked
J24 "DB125-3.81-4P-GN-S" DB125-3.81-4P-GN-S 1818,157 r180 top locked
J25 "DB125-3.81-8P-GN-S" DB125-3.81-8P-GN-S 6084.39,5503.29 r90 top locked
J26 "DB125-3.81-8P-GN-S" DB125-3.81-8P-GN-S 6084.39,4018.96 r90 top locked
J27 "DB125-3.81-8P-GN-S" DB125-3.81-8P-GN-S 6084.39,2537.63 r90 top locked
J28 "DB125-3.81-8P-GN-S" DB125-3.81-8P-GN-S 6084.39,1054.29 r90 top locked
L1 "BLM15AG601SN1D" IND-0402 2663,4086 r0 top locked
L2 "6.8uH" 0630CDMCCDS_6R8MC 3370.03,3104.01 r0 top locked
LED1 "RED" LED-0603 4008,3060 r0 top locked
LED2 "RED" LED-0603 4008,3153.27 r0 top locked
LED3 "RED" LED-0603 4008,3246.54 r0 top locked
LED4 "Emerald" LED-0603 881.55,4977.52 r0 top locked
LED5 "RED" LED-0603 881.55,4851.52 r0 top locked
LED6 "RED" LED-0603 4692,1230.54 r0 top locked
LED7 "NCD0603O2" LED-0603 4692,1288 r0 top locked
LED8 "RED" LED-0603 2567,1230.54 r0 top locked
LED9 "NCD0603O2" LED-0603 2567,1288 r0 top locked
LED10 "RED" LED-0603 3625.43,1230.54 r0 top locked
LED11 "NCD0603O2" LED-0603 3625.43,1288 r0 top locked
LED12 "RED" LED-0603 1500,1230.54 r0 top locked
LED13 "NCD0603O2" LED-0603 1500,1288 r0 top locked
NT1 "Net Tie_SMD" "Net Tie Pad" 5410,688.48 r180 top locked net-tie
NT2 "Net Tie_SMD" "Net Tie Pad" 5413,874.52 r180 top locked net-tie
NT3 "Net Tie_SMD" "Net Tie Pad" 4658.19,688.48 r0 top locked net-tie
NT4 "Net Tie_SMD" "Net Tie Pad" 4658.19,874.52 r0 top locked net-tie
NT5 "Net Tie_SMD" "Net Tie Pad" 3285,688.48 r180 top locked net-tie
NT6 "Net Tie_SMD" "Net Tie Pad" 3285,874.52 r180 top locked net-tie
NT7 "Net Tie_SMD" "Net Tie Pad" 2528.5,688.48 r0 top locked net-tie
NT8 "Net Tie_SMD" "Net Tie Pad" 2527.5,874.52 r0 top locked net-tie
NT9 "Net Tie_SMD" "Net Tie Pad" 4342,688.48 r180 top locked net-tie
NT10 "Net Tie_SMD" "Net Tie Pad" 4335,874.52 r180 top locked net-tie
NT11 "Net Tie_SMD" "Net Tie Pad" 3595.19,688.48 r0 top locked net-tie
NT12 "Net Tie_SMD" "Net Tie Pad" 3592.19,874.52 r0 top locked net-tie
NT13 "Net Tie_SMD" "Net Tie Pad" 2222,688.48 r180 top locked net-tie
NT14 "Net Tie_SMD" "Net Tie Pad" 2222,874.52 r180 top locked net-tie
NT15 "Net Tie_SMD" "Net Tie Pad" 1467,688.48 r0 top locked net-tie
NT16 "Net Tie_SMD" "Net Tie Pad" 1467,874.52 r0 top locked net-tie
NT17 "Net Tie_SMD" "Net Tie Pad" 5888.39,5128.29 r0 top locked net-tie
NT18 "Net Tie_SMD" "Net Tie Pad" 5888.39,5428.29 r0 top locked net-tie
NT19 "Net Tie_SMD" "Net Tie Pad" 5888.39,5728.29 r0 top locked net-tie
NT20 "Net Tie_SMD" "Net Tie Pad" 5888.39,3643.96 r0 top locked net-tie
NT21 "Net Tie_SMD" "Net Tie Pad" 5888.39,3943.96 r0 top locked net-tie
NT22 "Net Tie_SMD" "Net Tie Pad" 5888.39,4240.96 r0 top locked net-tie
NT23 "Net Tie_SMD" "Net Tie Pad" 5888.39,2162.63 r0 top locked net-tie
NT24 "Net Tie_SMD" "Net Tie Pad" 5888.39,2462.63 r0 top locked net-tie
NT25 "Net Tie_SMD" "Net Tie Pad" 5888.39,2762.29 r0 top locked net-tie
NT26 "Net Tie_SMD" "Net Tie Pad" 5888.39,679.29 r0 top locked net-tie
NT27 "Net Tie_SMD" "Net Tie Pad" 5888.39,979.29 r0 top locked net-tie
NT28 "Net Tie_SMD" "Net Tie Pad" 5888.39,1279.29 r0 top locked net-tie
R1 "10K" Res-0402 152.12,4578.41 r0 top locked
R2 "DNP" Res-0603 2744.37,3810 r270 top locked
R3 "DNP" Res-0603 2744.37,3916 r90 top locked
R4 "0R" Res-0603 2874.12,4396 r180 top locked
R5 "0R" Res-0603 2874.13,4183.96 r0 top locked
R7 "10K" Res-0402 4939.33,4101.51 r180 top locked
R8 "10K" Res-0402 4939.33,4141.6 r180 top locked
R9 "10K" Res-0402 4939.33,4261.86 r180 top locked
R10 "10K" Res-0402 4939.33,4221.77 r180 top locked
R11 "10K" Res-0402 4939.33,4181.69 r180 top locked
R12 "10K" Res-0402 4938.89,2714.87 r180 top locked
R13 "10K" Res-0402 4938.89,2834.63 r180 top locked
R14 "10K" Res-0402 4938.89,2794.71 r180 top locked
R15 "10K" Res-0402 4938.89,2754.79 r180 top locked
R16 "1M" Res-0402 137,2630 r180 top locked
R17 "4.7K" Res-0402 2666,4200 r0 top locked
R18 "4.7K" Res-0402 2666,4239 r0 top locked
R19 "5.1K" Res-0402 340.37,2440 r0 top locked
R20 "5.1K" Res-0402 340.37,2310 r0 top locked
R21 "10K" Res-0402 518,2968 r0 top locked
R22 "DNP" Res-0402 429,2263 r0 top locked
R23 "33R" Res-0402 229,5958 r180 top locked
R24 "33R" Res-0402 229,5858 r180 top locked
R25 "33R" Res-0402 229,5758 r180 top locked
R26 "33R" Res-0402 229,5658 r180 top locked
R27 "33R" Res-0402 229,5558 r180 top locked
R28 "33R" Res-0402 229,5458 r180 top locked
R29 "33R" Res-0402 229,5358 r180 top locked
R30 "33R" Res-0402 229,5258 r180 top locked
R31 "10K" Res-0402 518,2869 r0 top locked
R32 "10K" Res-0402 518,2769 r0 top locked
R33 "10K" Res-0402 175,3676 r270 top locked
R34 "100K" Res-0402 1005,2047 r0 top locked
R35 "158K" Res-0402 2944.03,3132.01 r270 top locked
R36 "30.1K" Res-0402 3061.03,3151.01 r180 top locked
R37 "3.9K" Res-0402 3919,3060 r0 top locked value=3.9kR
R38 "470R" Res-0402 3919,3153.27 r0 top locked
R39 "200R" Res-0402 3919,3246.54 r0 top locked
R40 "100K" Res-0402 3739,5478.22 r270 top locked
R41 "100K" Res-0402 2981.51,5478.22 r270 top locked
R42 "33K" Res-0402 3668,5611.69 r0 top locked
R43 "33K" Res-0402 2912.19,5611.69 r0 top locked
R44 "0R" Res-0402 3620.91,5353.27 r270 top locked
R45 "0R" Res-0402 3513,5353.27 r270 top locked
R46 "0R" Res-0402 2864.92,5353.27 r270 top locked
R47 "0R" Res-0402 2757.99,5353.27 r270 top locked
R48 "60.4R" Res-0603 3791,5554 r0 top locked
R49 "60.4R" Res-0603 3791,5605 r180 top locked
R50 "60.4R" Res-0603 3034.51,5554 r0 top locked
R51 "60.4R" Res-0603 3034.51,5605 r180 top locked
R52 "0R" Res-0402 3669.65,5848.98 r90 top locked
R53 "0R" Res-0402 3710.65,5848.98 r90 top locked
R54 "0R" Res-0402 2912.51,5848.98 r90 top locked
R55 "0R" Res-0402 2953.51,5848.98 r90 top locked
R56 "0R" Res-0402 4380.26,5219.25 r90 top locked
R57 "0R" Res-0402 4566.66,5282.43 r180 top locked
R58 "4.7K" Res-0402 4361.76,5282.43 r180 top locked
R59 "4.7K" Res-0402 4484.25,5219.25 r270 top locked
R60 "4.7K" Res-0402 4444.93,5219.25 r270 top locked
R61 "4.7K" Res-0402 4547.76,5219.25 r270 top locked
R62 "4.7K" Res-0402 4425.76,5494.11 r180 top locked
R63 "4.7K" Res-0402 4498.25,5494.22 r180 top locked
R64 "120R" Res-0603 4420.76,5669.24 r180 top locked
R65 "22R" Res-0201 4490.97,5670.73 r90 top locked
R66 "22R" Res-0201 4520.33,5670.73 r90 top locked
R67 "22R" Res-0201 5075.76,5477.57 r270 top locked
R68 "22R" Res-0201 5025.76,5477.56 r270 top locked
R69 "0R" Res-0402 5076.26,5114.23 r270 top locked
R70 "0R" Res-0402 5025.76,5114.22 r270 top locked
R71 "4.7K" Res-0402 1950,4885 r0 top locked
R72 "4.7K" Res-0402 1950,4925 r0 top locked
R73 "DNP" Res-0402 1397.55,4858.32 r0 top locked
R74 "4.7K" Res-0402 1397.55,4899.12 r0 top locked
R75 "12.1k" Res-0402 1654,5263 r180 top locked
R76 "10K" Res-0402 1950,4965 r180 top locked
R77 "10K" Res-0402 175,6159 r90 top locked
R78 "49.9R" Res-0603 1044.31,5622.72 r180 top locked
R79 "49.9R" Res-0603 1863,5622.55 r180 top locked
R80 "49.9R" Res-0603 1151.05,5622.72 r0 top locked
R81 "49.9R" Res-0603 1969.74,5622.55 r0 top locked
R82 "10K" Res-0201 2158.55,4837.52 r180 top locked
R83 "49.9R" Res-0603 1286.31,5622.72 r180 top locked
R84 "49.9R" Res-0603 2104,5622.55 r180 top locked
R85 "49.9R" Res-0603 1392.31,5622.72 r0 top locked
R86 "49.9R" Res-0603 2210,5622.55 r0 top locked
R87 "0R" Res-0402 1230,5575.55 r0 top locked
R88 "0R" Res-0402 2047.69,5575.55 r0 top locked
R89 "330R" Res-0603 1530,6258.31 r90 top locked
R90 "330R" Res-0603 2347,6258.31 r90 top locked
R91 "10K" Res-0402 1022.55,4929.52 r180 top
R92 "330R" Res-0603 1005.55,4977.52 r0 top locked
R93 "10K" Res-0402 1530,6169 r90 top locked
R94 "10K" Res-0402 2347,6169 r90 top locked
R95 "10K" Res-0402 1022.55,4803.52 r180 top
R96 "330R" Res-0603 1005.55,4851.52 r0 top locked
R97 "3.3K" Res-0402 4867.06,1281.5 r270 top locked
R98 "3.3K" Res-0402 2743.06,1281.5 r270 top locked
R99 "200R" Res-0402 4826.53,1281.5 r270 top locked
R100 "200R" Res-0402 4786,1281.5 r270 top locked
R101 "200R" Res-0402 2702.53,1281.5 r270 top locked
R102 "200R" Res-0402 2662,1281.5 r270 top locked
R103 "0R" Res-0402 4949.13,1287.5 r270 top locked
R104 "0R" Res-0402 4908.6,1287.5 r270 top locked
R105 "0R" Res-0402 2825.13,1287.5 r270 top locked
R106 "0R" Res-0402 2784.6,1287.5 r270 top locked
R107 "10K" Res-0402 5393.79,3563.62 r270 top locked
R108 "50mR" RES-2010 5312,781 r270 top locked
R109 "50mR" RES-2010 4759,781 r270 top locked
R110 "50mR" RES-2010 3187,781 r270 top locked
R111 "50mR" RES-2010 2627,781 r270 top locked
R112 "3.3K" Res-0402 3801.49,1281.5 r270 top locked
R113 "3.3K" Res-0402 1676.06,1281.5 r270 top locked
R114 "200R" Res-0402 3760.96,1281.5 r270 top locked
R115 "200R" Res-0402 3720.43,1281.5 r270 top locked
R116 "200R" Res-0402 1635.53,1281.5 r270 top locked
R117 "200R" Res-0402 1595,1281.5 r270 top locked
R118 "0R" Res-0402 3883.55,1287.5 r270 top locked
R119 "0R" Res-0402 3843.02,1287.5 r270 top locked
R120 "0R" Res-0402 1758.13,1287.5 r270 top locked
R121 "0R" Res-0402 1717.6,1287.5 r270 top locked
R122 "50mR" RES-2010 4236,781 r270 top locked
R123 "50mR" RES-2010 3690,781 r270 top locked
R124 "50mR" RES-2010 2122.52,781 r270 top locked
R125 "50mR" RES-2010 1567,781 r270 top locked
R126 "240R" Res-0402 5652.39,5041.29 r270 top locked
R127 "240R" Res-0402 5652.39,5456.29 r270 top locked
R128 "240R" Res-0402 5652.39,5870.29 r270 top locked
R129 "240R" Res-0402 5652.39,3556.29 r270 top locked
R130 "240R" Res-0402 5652.39,3964.79 r270 top locked
R131 "240R" Res-0402 5652.39,4383.29 r270 top locked
R132 "DNP" Res-0402 5652.39,5115.29 r270 top locked
R133 "DNP" Res-0402 5652.39,5530.29 r270 top locked
R134 "DNP" Res-0402 5652.39,5944.29 r270 top locked
R135 "DNP" Res-0402 5652.39,3630.29 r270 top locked
R136 "DNP" Res-0402 5652.39,4038.79 r270 top locked
R137 "DNP" Res-0402 5652.39,4457.29 r270 top locked
R138 "0R" Res-0402 5762.39,5255.29 r0 top locked
R139 "0R" Res-0402 5762.39,5668.79 r0 top locked
R140 "0R" Res-0402 5762.39,6082.29 r0 top locked
R141 "0R" Res-0402 5762.39,3770.29 r0 top locked
R142 "0R" Res-0402 5762.39,4178.29 r0 top locked
R143 "0R" Res-0402 5762.39,4595.29 r0 top locked
R144 "240R" Res-0402 5652.39,2075.29 r270 top locked
R145 "240R" Res-0402 5652.39,2479.79 r270 top locked
R146 "240R" Res-0402 5652.39,2901.29 r270 top locked
R147 "240R" Res-0402 5652.39,595.79 r270 top locked
R148 "240R" Res-0402 5652.39,997.29 r270 top locked
R149 "240R" Res-0402 5652.39,1412.79 r270 top locked
R150 "DNP" Res-0402 5652.39,2147.79 r270 top locked
R151 "DNP" Res-0402 5652.39,2553.29 r270 top locked
R152 "DNP" Res-0402 5652.39,2975.29 r270 top locked
R153 "DNP" Res-0402 5652.39,667.29 r270 top locked
R154 "DNP" Res-0402 5652.39,1070.29 r270 top locked
R155 "DNP" Res-0402 5652.39,1485.29 r270 top locked
R156 "0R" Res-0402 5762.39,2288.29 r0 top locked
R157 "0R" Res-0402 5762.39,2694.29 r0 top locked
R158 "0R" Res-0402 5762.39,3116.29 r0 top locked
R159 "0R" Res-0402 5762.39,807.29 r0 top locked
R160 "0R" Res-0402 5762.39,1212.29 r0 top locked
R161 "0R" Res-0402 5762.39,1625.29 r0 top locked
SW1 "B3U-1000P" B3U-1000P 56.49,3678 r90 top locked
SW2 "DSIC03LSGET" DSIC03LSGET 240,2869 r180 top locked
SW3 "B3U-1000P" B3U-1000P 56.49,6160.02 r90 top locked
TP1 "TEST POINT" Test-point 4249,3060 r0 top locked
TP2 "TEST POINT" Test-point 4249,3153.27 r0 top locked
TP3 "TEST POINT" Test-point 4249,3246.54 r0 top locked
TP4 "TEST POINT" Test-point 4247,3340 r0 top
TP5 "TEST POINT" Test-point 1261.57,4791 r0 top locked
U1 "MCP23017T-E/SS" SSOP-28-208mil 5181.83,4062.86 r180 top locked
U2 "STM32G0B1RET6" LQFP-64(10x10) 2336,4091 r180 top locked
U3 "MCP23017T-E/SS" SSOP-28-208mil 5181.83,2658.29 r180 top locked
U4 "SI7145DP-T1-GE3" PowerPAK-SO-8 962,1913 r180 top locked
U5 "AP63300WU-7" TSOT-23-6 3091.03,3066.01 r0 top locked
U6 "BL8071CLATR33" "SOT- 223" 3712.03,3055.01 r0 top locked
U7 "TCAN1463DMTRQ1" VSON-14(3x4.5) 3620,5515.69 r90 top locked
U8 "TCAN1463DMTRQ1" VSON-14(3x4.5) 2863.92,5515.49 r90 top locked
U9 "THVD2450DRBR" SON-8-EP(3x3) 4461.75,5337.55 r90 top locked
U10 "MAX3232ESE" SOP-16 5200.76,5300.97 r270 top locked
U11 "LAN9253-SVB QFN64" QFN-64-EP(9x9) 1668.55,4901.52 r0 top locked
U12 "CAT24C256WI-GT3" CAT24C256WI-GT3 2344.55,4862.52 r180 top locked
U13 "DRV8711DCPR" HTSSOP-38-EP-4.4mm 5018.11,1066.26 r270 top locked
U14 "DRV8711DCPR" HTSSOP-38-EP-4.4mm 2892.11,1068.24 r270 top locked
U15 "ADS1115IDGSR" VSSOP-10 5373.79,3378.62 r270 top locked
U16 "CSD88537ND" SOIC-8 5337,475 r270 top locked
U17 "CSD88537ND" SOIC-8 5119.67,475 r270 top locked
U18 "CSD88537ND" SOIC-8 4902.33,475 r270 top locked
U19 "CSD88537ND" SOIC-8 4685,475 r270 top locked
U20 "CSD88537ND" SOIC-8 3210,475 r270 top locked
U21 "CSD88537ND" SOIC-8 2992.67,475 r270 top locked
U22 "CSD88537ND" SOIC-8 2775.33,475 r270 top locked
U23 "CSD88537ND" SOIC-8 2558,475 r270 top locked
U24 "DRV8711DCPR" HTSSOP-38-EP-4.4mm 3952.11,1067.59 r270 top locked
U25 "DRV8711DCPR" HTSSOP-38-EP-4.4mm 1826.11,1068.24 r270 top locked
U26 "CSD88537ND" SOIC-8 4269,475 r270 top locked
U27 "CSD88537ND" SOIC-8 4051.67,475 r270 top locked
U28 "CSD88537ND" SOIC-8 3834.33,475 r270 top locked
U29 "CSD88537ND" SOIC-8 3617,475 r270 top locked
U30 "CSD88537ND" SOIC-8 2148,475 r270 top locked
U31 "CSD88537ND" SOIC-8 1929.33,475 r270 top locked
U32 "CSD88537ND" SOIC-8 1710.67,475 r270 top locked
U33 "CSD88537ND" SOIC-8 1492,475 r270 top locked
U34 "IS181GB" SOP-4_2.54 5762.39,5071.29 r90 top locked
U35 "IS181GB" SOP-4_2.54 5762.39,5485.79 r90 top locked
U36 "IS181GB" SOP-4_2.54 5762.39,5900.29 r90 top locked
U37 "IS181GB" SOP-4_2.54 5762.39,3588.26 r90 top locked
U38 "IS181GB" SOP-4_2.54 5762.39,3994.29 r90 top locked
U39 "IS181GB" SOP-4_2.54 5762.39,4412.29 r90 top locked
U40 "IS181GB" SOP-4_2.54 5762.39,2104.26 r90 top locked
U41 "IS181GB" SOP-4_2.54 5762.39,2510.29 r90 top locked
U42 "IS181GB" SOP-4_2.54 5762.39,2928.29 r90 top locked
U43 "IS181GB" SOP-4_2.54 5762.39,623.26 r90 top locked
U44 "IS181GB" SOP-4_2.54 5762.39,1029.29 r90 top locked
U45 "IS181GB" SOP-4_2.54 5762.39,1441.29 r90 top locked
X1 "DNP" MC-306 2938,3864 r0 top locked value=32.786kHz
X2 "8MHz" 5TJ480000XYLBC_ 2874.37,4289.03 r180 top locked
X3 "25MHz" SMD3225-4P 1243.25,5074.84 r180 top locked

## Footprints (in the part's own frame and the unit in brackets; to place one, negate y for a bottom-side part, rotate by r counter-clockwise, add the part's x,y. Pads: shape width x height; smd on the part's side, far side on the other; paste and mask are expansions set on the pad)
5TJ480000XYLBC_ [mm]
  rect 1.8x1.3 smd mask+0.07: 1(-1.9,-1.15) 2(1.9,-1.15) 3(1.9,1.15) 4(-1.9,1.15)
  silkscreen extent -3.05,-1.65 2.54,1.65, body extent -2.5,-1.6 2.5,1.6, height 1
178.6165.0002 [mm]
  rect 2.2x2.2 hole 1.5 paste-2539.97 mask+0.051: 1(-6.4,1.25)
  round 2.2 hole 1.5 paste-2539.97 mask+0.051: 2(-2.9,1.25) 3(2.9,1.25) 4(6.4,1.25) 5(6.4,-1.25) 6(2.9,-1.25) 7(-2.9,-1.25) 8(-6.4,-1.25)
  round 0 hole 2.5 unplated paste-2539.97: ""(0,0)
  silkscreen extent -10.03,-3.05 10.03,3.05, body extent -10,-3 10,3, height 17.5
0630CDMCCDS_6R8MC [mm]
  rect 2.35x3.5 smd: 1(-3.025,0) 2(3.025,0)
  silkscreen extent -3.71,-3.3 3.71,3.3, body extent -3.65,-3.3 3.65,3.3, height 3
1715721 [mm]
  rect 2.5x2.5 hole 1.4 paste+0 mask+0.051: 1(-2.54,0)
  round 2.5 hole 1.4 paste+0 mask+0.051: 2(2.54,0)
  silkscreen extent -5.08,-4.62 5.08,5.18, body extent -5.64,-4.62 5.09,5.21, height 14.2
B3B-XH-A(LF)(SN)_ [mm]
  rect 2x2 hole 1: 1(-3.81,0)
  round 2 hole 1: 2(-1.27,0) 3(1.27,0)
  silkscreen extent -6.32,-2.46 3.78,3.48, body extent -6.22,-2.36 3.68,3.39, height 7
B3U-1000P [mm] "SWITCH TACTILE SPST-NO 0.05A 12V"
  rect 0.82x1.72 smd: 1(-1.7,0) 2(1.7,0)
  silkscreen extent -1.57,-1.3 1.57,1.3, body extent -2,-1.26 2,1.24, height 1.6
Cap-0402 [mil]
  rect 18x25 smd mask+2.36: 1(-18.5,0) 2(18.5,0)
  silkscreen extent -31,-16 31,16, body extent -20,-10 20,10, height 19
cap-0402 [mil]
  rect 18x25 smd mask+2.36: 1(-18.5,0) 2(18.5,0)
  silkscreen extent -31,-16 31,16, body extent -20,-10 20,10, height 19
Cap-0603 [mil]
  rect 30x35 smd mask+2.36: 1(-30,0) 2(30,0)
  silkscreen extent -49,-21 49,21, body extent -32,-16 31,16, height 34
Cap-0805 [mil] "SMD 0805"
  rect 40x60 smd mask+2.76: 1(-40,0) 2(40,0)
  silkscreen extent -64,-34 64,34, body extent -39,-25 39,25, height 30
Cap-1206 [mil] "SMD 1206"
  rect 60x70 smd: 1(-50,0) 2(50,0)
  silkscreen extent -84,-39 84,39, body extent -63,-31 63,32, height 39
CAT24C256WI-GT3 [mm]
  rect 1.57x0.62 smd: 1(-2.7,1.905) 2(-2.7,0.635) 3(-2.7,-0.635) 4(-2.7,-1.905) 5(2.7,-1.905) 6(2.7,-0.635) 7(2.7,0.635) 8(2.7,1.905)
  silkscreen extent -3,-2.44 1.85,2.64, body extent -3,-2.45 3,2.45, height 1.75
DB125-3.81-4P-GN-S [mm]
  rect 2.7x2.7 hole 1.3 paste+0 mask+0.051: 1(-5.715,0)
  round 2.7 hole 1.3 paste+0 mask+0.051: 2(-1.905,0) 3(1.905,0) 4(5.715,0)
  silkscreen extent -7.82,-3.47 7.93,3.9, body extent -7.82,-3.53 7.92,3.87, height 8.5
DB125-3.81-8P-GN-S [mm]
  rect 2.5x2.5 hole 1.25 paste+0 mask+0.05: 1(-13.335,0)
  round 2.5 hole 1.25 paste+0 mask+0.05: 2(-9.525,0) 3(-5.715,0) 4(-1.905,0) 5(1.905,0) 6(5.715,0) 7(9.525,0) 8(13.335,0)
  silkscreen extent -15.75,-3.5 15.24,3.9, body extent -15.65,-3.5 15.25,3.9, height 8.5
DB128L-5.08-3P-BK-S [mm]
  round 3 hole 1.6 paste+0 mask+0.051: 1(-5.08,0) 2(0,0) 3(5.08,0)
  silkscreen extent -7.73,-4.85 8.22,5.15, body extent -7.62,-4.9 8.22,5.1, height 14
DSIC03LSGET [mil]
  rect 90x60 smd paste+0 mask+2: 1(-177.16,100) 2(-177.16,0) 3(-177.16,-100) 4(177.16,-100) 5(177.16,0) 6(177.16,100)
  silkscreen extent -118,-150 118,150, body extent -183,-150 183,150, height 163
DSN0603-2 [mm]
  rect 0.2x0.24 smd mask+0.055: 1(-0.2,0) 2(0.2,0)
  silkscreen extent -0.38,-0.2 0.38,0.2, body extent -0.3,-0.15 0.3,0.15, height 0.32
Fuse-1812_ [mm]
  rect 1.78x3.2 smd: 1(-2.49,0) 2(2.49,0)
  silkscreen extent -1.75,-1.8 1.85,1.8, body extent -2.36,-1.74 2.37,1.74, height 1.03
HDR1X2_ [mm] "CONN HEADER VERT 2POS 2.54MM"
  rect 1.5x1.5 hole 0.9: 1(0,0)
  round 1.5 hole 0.9: 2(2.54,0)
  silkscreen extent -1.27,-1.27 3.81,1.27, body extent -1.27,-1.27 3.81,1.27, height 8.44
HDR1X3_ [mm] "Connector; Header; 3 Position"
  rect 1.5x1.5 hole 0.9: 1(0,0)
  round 1.5 hole 0.9: 2(2.54,0) 3(5.08,0)
  silkscreen extent -1.27,-1.27 6.35,1.27, body extent -1.27,-1.24 6.35,1.25, height 8.54
HDR1X4_ [mm] "Connector; Header; 4 Position"
  rect 1.6x1.6 hole 0.95: 1(0,0)
  round 1.6 hole 0.95: 2(2.54,0) 3(5.08,0) 4(7.62,0)
  silkscreen extent -1.27,-1.27 8.89,1.27, body extent -1.27,-1.27 8.89,1.27, height 9.5
"HDR 1x8 TH male" [mm]
  rect 1.8x1.8 hole 1 paste+0 mask+0.051: 1(-8.89,0)
  round 1.8 hole 1 paste+0 mask+0.051: 2(-6.35,0) 3(-3.81,0) 4(-1.27,0) 5(1.27,0) 6(3.81,0) 7(6.35,0) 8(8.89,0)
  silkscreen extent -10.16,-1.27 10.16,1.27, body extent -10.26,-1.25 10.27,1.25, height 8.5
HR911105A [mm]
  rect 1.398x1.398 hole 0.89: 1(4.45,-4.355)
  round 1.398 hole 0.89: 2(3.18,-6.895) 3(1.91,-4.355) 4(0.64,-6.895) 5(-0.63,-4.355) 6(-1.9,-6.895) 7(-3.17,-4.355) 8(-4.44,-6.895)
  round 1.53 hole 1.02: 9(6.625,6.895) 10(4.085,6.895) 11(-4.085,6.895) 12(-6.625,6.895)
  round 0 hole 3.25 unplated: MH1(-5.715,1.995) MH2(5.715,1.995)
  round 2.445 hole 1.63: "Shield 1"(-7.745,-1.055) "Shield 2"(7.745,-1.055)
  silkscreen extent -8,-8.48 8,12.92, body extent -8.02,-8.42 8.02,12.88, height 13.5
HTSSOP-38-EP-4.4mm [mm]
  rect 1.6x0.3 smd paste+0 mask+0.051: 1(-2.8,4.5) 2(-2.8,4) 3(-2.8,3.5) 4(-2.8,3) 5(-2.8,2.5) 6(-2.8,2) 7(-2.8,1.5) 8(-2.8,1) 9(-2.8,0.5) 10(-2.8,0) 11(-2.8,-0.5) 12(-2.8,-1) 13(-2.8,-1.5) 14(-2.8,-2) 15(-2.8,-2.5) 16(-2.8,-3) 17(-2.8,-3.5) 18(-2.8,-4) 19(-2.8,-4.5) 20(2.8,-4.5) 21(2.8,-4) 22(2.8,-3.5) 23(2.8,-3) 24(2.8,-2.5) 25(2.8,-2) 26(2.8,-1.5) 27(2.8,-1) 28(2.8,-0.5) 29(2.8,0) 30(2.8,0.5) 31(2.8,1) 32(2.8,1.5) 33(2.8,2) 34(2.8,2.5) 35(2.8,3) 36(2.8,3.5) 37(2.8,4) 38(2.8,4.5)
  rect 2.9x4.8 smd paste+0 mask+0.051: 39(0,0)
  silkscreen extent -3.85,-4.88 1.83,4.88, body extent -3.2,-4.83 3.2,4.84, height 1.3
IND-0402 [mm]
  rect 0.4x0.6 smd: 1(-0.35,0) 2(0.35,0)
  silkscreen extent -0.71,-0.46 0.71,0.46, body extent -0.5,-0.25 0.5,0.25, height 0.25
"IND-0603 (1608 Metric)" [mm] "0.063\" L x 0.032\" W (1.60mm x 0.80mm)"
  rect 0.6x0.8 smd: 1(-0.7,0) 2(0.7,0)
  silkscreen extent -0.2,-0.46 0.23,0.46, body extent -0.8,-0.4 0.8,0.4, height 0.78
LED-0603 [mm]
  rect 0.5x1 smd: 1(-0.75,0) 2(0.75,0)
  silkscreen extent -1.12,-0.66 1.75,0.66, body extent -0.82,-0.37 0.82,0.36, height 0.68
LQFP-64(10x10) [mm]
  rect 1.2x0.3 smd paste+0 mask+0.051: 1(-5.75,3.75) 2(-5.75,3.25) 3(-5.75,2.75) 4(-5.75,2.25) 5(-5.75,1.75) 6(-5.75,1.25) 7(-5.75,0.75) 8(-5.75,0.25) 9(-5.75,-0.25) 10(-5.75,-0.75) 11(-5.75,-1.25) 12(-5.75,-1.75) 13(-5.75,-2.25) 14(-5.75,-2.75) 15(-5.75,-3.25) 16(-5.75,-3.75) 33(5.75,-3.75) 34(5.75,-3.25) 35(5.75,-2.75) 36(5.75,-2.25) 37(5.75,-1.75) 38(5.75,-1.25) 39(5.75,-0.75) 40(5.75,-0.25) 41(5.75,0.25) 42(5.75,0.75) 43(5.75,1.25) 44(5.75,1.75) 45(5.75,2.25) 46(5.75,2.75) 47(5.75,3.25) 48(5.75,3.75)
  rect 0.3x1.2 smd paste+0 mask+0.051: 17(-3.75,-5.75) 18(-3.25,-5.75) 19(-2.75,-5.75) 20(-2.25,-5.75) 21(-1.75,-5.75) 22(-1.25,-5.75) 23(-0.75,-5.75) 24(-0.25,-5.75) 25(0.25,-5.75) 26(0.75,-5.75) 27(1.25,-5.75) 28(1.75,-5.75) 29(2.25,-5.75) 30(2.75,-5.75) 31(3.25,-5.75) 32(3.75,-5.75) 49(3.75,5.75) 50(3.25,5.75) 51(2.75,5.75) 52(2.25,5.75) 53(1.75,5.75) 54(1.25,5.75) 55(0.75,5.75) 56(0.25,5.75) 57(-0.25,5.75) 58(-0.75,5.75) 59(-1.25,5.75) 60(-1.75,5.75) 61(-2.25,5.75) 62(-2.75,5.75) 63(-3.25,5.75) 64(-3.75,5.75)
  silkscreen extent -6.64,-5 5,5, body extent -6,-6 6,6, height 1.6
MC-306 [mm]
  rect 1.3x1.9 smd: 1(-2.75,-1.6) 2(2.75,-1.6) 3(2.75,1.6) 4(-2.75,1.6)
  silkscreen extent -4.06,-1.96 4.06,1.96, body extent -4,-1.9 4,1.9, height 2.54
"Net Tie Pad" [mil]
  rect 18x25 smd mask-10: 1(-18.5,0) 2(18.5,0)
  Top Layer region: -15.33,-4.93 14.67,-4.93 14.67,5.07 -15.33,5.07
PowerPAK-SO-8 [mm]
  rect 1.15x0.7 smd paste+0 mask+0.051: 1(-1.963,1.905) 2(-1.967,0.635) 3(-1.967,-0.635) 4(-1.963,-1.905)
  rect 1x1 smd: 5_6(1.967,0)
  rect 0.595x0.61 smd paste+0 mask+0.051: 7(0.813,2.388) 8(0.813,-2.388)
  Top Layer region: 4.317,-2.4 4.317,2.4 2.667,2.4 2.667,2.15 -0.383,2.15 -0.383,-2.15 2.667,-2.15 2.667,-2.4 4.317,-2.4
  silkscreen extent -2.8,-2.6 2.87,2.6, body extent -2.24,-2.57 3.91,2.57, height 1.24
QFN-64-EP(9x9) [mm]
  rect 0.762x0.254 smd: 1(-4.4,3.75)
  rect 0.7x0.25 smd: 2(-4.4,3.25) 3(-4.4,2.75) 4(-4.4,2.25) 5(-4.4,1.75) 6(-4.4,1.25) 7(-4.4,0.75) 8(-4.4,0.25) 9(-4.4,-0.25) 10(-4.4,-0.75) 11(-4.4,-1.25) 12(-4.4,-1.75) 13(-4.4,-2.25) 14(-4.4,-2.75) 15(-4.4,-3.25) 16(-4.4,-3.75) 33(4.4,-3.75) 34(4.4,-3.25) 35(4.4,-2.75) 36(4.4,-2.25) 37(4.4,-1.75) 38(4.4,-1.25) 39(4.4,-0.75) 40(4.4,-0.25) 41(4.4,0.25) 42(4.4,0.75) 43(4.4,1.25) 44(4.4,1.75) 45(4.4,2.25) 46(4.4,2.75) 47(4.4,3.25) 48(4.4,3.75)
  rect 0.25x0.7 smd: 17(-3.75,-4.4) 18(-3.25,-4.4) 19(-2.75,-4.4) 20(-2.25,-4.4) 21(-1.75,-4.4) 22(-1.25,-4.4) 23(-0.75,-4.4) 24(-0.25,-4.4) 25(0.25,-4.4) 26(0.75,-4.4) 27(1.25,-4.4) 28(1.75,-4.4) 29(2.25,-4.4) 30(2.75,-4.4) 31(3.25,-4.4) 32(3.75,-4.4) 49(3.75,4.4) 50(3.25,4.4) 51(2.75,4.4) 52(2.25,4.4) 53(1.75,4.4) 54(1.25,4.4) 55(0.75,4.4) 56(0.25,4.4) 57(-0.25,4.4) 58(-0.75,4.4) 59(-1.25,4.4) 60(-1.75,4.4) 61(-2.25,4.4) 62(-2.75,4.4) 63(-3.25,4.4) 64(-3.75,4.4)
  rect 7.15x7.15 smd: 65(0,0)
  silkscreen extent -5,-4.5 4.54,4.5, body extent -4.52,-4.52 4.52,4.52, height 0.9
Res-0201 [mm]
  rect 0.27x0.37 smd mask+0.055: 1(-0.275,0) 2(0.275,0)
  silkscreen extent -0.48,-0.25 0.48,0.25, body extent -0.3,-0.15 0.3,0.15, height 0.29
Res-0402 [mil]
  rect 18x25 smd mask+2.17: 1(-18.5,0) 2(18.5,0)
  silkscreen extent -32,-17 32,16, body extent -23,-11 23,11, height 16
Res-0603 [mil]
  rect 30x35 smd: 1(-30,0) 2(30,0)
  silkscreen extent -48,-21 48,21, body extent -31,-17 31,17, height 18
RES-2010 [mm]
  rect 0.9x2.8 smd: 1(-2.35,0) 2(2.35,0)
  silkscreen extent -2.92,-1.52 2.92,1.52, body extent -2.5,-1.25 2.5,1.25, height 0.6
RVT1H101M0607 [mm]
  rect 3.5x1.6 smd: 1(-2.8,0) 2(2.8,0)
  silkscreen extent -4.27,-3.33 3.32,3.33, body extent -3.31,-3.33 3.29,3.27, height 7.94
"SMB Bi Directional" [mm]
  rect 2.8x2.4 smd: 1(-2.3,0) 2(2.3,0)
  silkscreen extent -2.21,-1.85 2.39,1.85, body extent -2.7,-1.8 2.7,1.8, height 2.3
SMB_ [mm]
  rect 2.8x2.4 smd: 1(-2.3,0) 2(2.3,0)
  silkscreen extent -2.21,-1.9 4.83,1.91, body extent -2.7,-1.8 2.7,1.8, height 2.3
SMD3225-4P [mm]
  rect 1.4x1.2 smd: 1(-1.1,-0.85) 2(1.1,-0.85) 3(1.1,0.85) 4(-1.1,0.85)
  silkscreen extent -2.08,-1.3 1.65,1.3, body extent -1.6,-1.25 1.6,1.25, height 0.81
SOD-123 [mm]
  rect 0.95x0.9 smd: 1(-1.575,0) 2(1.575,0)
  silkscreen extent -1.37,-0.8 2.82,0.8, body extent -1.82,-0.78 1.83,0.78, height 1.5
SOD-323 [mm]
  rect 0.8x0.9 smd mask+0.055: 1(-1.15,0) 2(1.15,0)
  silkscreen extent -2.01,-0.78 0.94,0.79, body extent -1.3,-0.67 1.3,0.67, height 1.1
SOD-923. [mm]
  rect 0.36x0.27 smd: 1(-0.42,0) 2(0.42,0)
  silkscreen extent -1.12,-0.43 0.46,0.43, body extent -0.52,-0.32 0.53,0.33, height 0.43
SOIC-8 [mm]
  rect 1.55x0.6 smd: 1(-2.7,1.905) 2(-2.7,0.635) 3(-2.7,-0.635) 4(-2.7,-1.905) 5(2.7,-1.905) 6(2.7,-0.635) 7(2.7,0.635) 8(2.7,1.905)
  silkscreen extent -3.76,-2.49 1.99,2.49, body extent -3,-2.45 3,2.45, height 1.7
SON-8-EP(3x3) [mm]
  rect 0.6x0.3 smd paste+0 mask+0.051: 1(-1.4,0.975) 2(-1.4,0.325) 3(-1.4,-0.325) 4(-1.4,-0.975) 5(1.4,-0.975) 6(1.4,-0.325) 7(1.4,0.325) 8(1.4,0.975)
  rect 1.65x2.4 smd paste+0 mask+0.051: 9(0,0)
  silkscreen extent -2.01,-1.47 1.47,1.47, body extent -1.51,-1.5 1.51,1.5, height 1.01
SOP-4_2.54 [mm]
  rect 1.45x0.8 smd: 1(-3.125,1.27) 2(-3.125,-1.27) 3(3.125,-1.27) 4(3.125,1.27)
  silkscreen extent -4.14,-2.06 1.68,2.06, body extent -3.43,-2 3.43,2, height 2.02
SOP-16 [mil]
  rect 57.55x22 smd: 1(-107.27,175) 2(-107.27,125) 3(-107.27,75) 4(-107.27,25) 5(-107.27,-25) 6(-107.27,-75) 7(-107.27,-125) 8(-107.27,-175) 9(107.27,-175) 10(107.27,-125) 11(107.27,-75) 12(107.27,-25) 13(107.27,25) 14(107.27,75) 15(107.27,125) 16(107.27,175)
  silkscreen extent -149,-199 84,199, body extent -122,-197 122,197, height 69
SOT-23 [mm] "TRANS NPN 40V 0.6A SOT23"
  rect 0.82x0.92 smd: 1(-0.95,-1) 2(0.95,-1) 3(0,1)
  silkscreen extent -1.68,-1.3 1.55,0.81, body extent -1.5,-1.25 1.5,1.25, height 1.05
"SOT- 223" [mm]
  rect 1.5x2 smd: 1(-2.3,-3.05) 2(0,-3.05) 3(2.3,-3.05)
  rect 3.8x2 smd: 4(0,3.05)
  silkscreen extent -3.35,-3.2 3.3,1.8, body extent -3.25,-3.5 3.25,3.5, height 1.61
SSOP-28-208mil [mm]
  rect 1.85x0.45 smd: 1(-3.4,4.225) 2(-3.4,3.575) 3(-3.4,2.925) 4(-3.4,2.275) 5(-3.4,1.625) 6(-3.4,0.975) 7(-3.4,0.325) 8(-3.4,-0.325) 9(-3.4,-0.975) 10(-3.4,-1.625) 11(-3.4,-2.275) 12(-3.4,-2.925) 13(-3.4,-3.575) 14(-3.4,-4.225) 15(3.4,-4.225) 16(3.4,-3.575) 17(3.4,-2.925) 18(3.4,-2.275) 19(3.4,-1.625) 20(3.4,-0.975) 21(3.4,-0.325) 22(3.4,0.325) 23(3.4,0.975) 24(3.4,1.625) 25(3.4,2.275) 26(3.4,2.925) 27(3.4,3.575) 28(3.4,4.225)
  silkscreen extent -4.7,-5.21 2.72,5.21, body extent -3.88,-5.17 3.88,5.17, height 2.15
T44001 [mm]
  round 2.9 hole 1.9 paste+0 mask+0.051: 1(-2.5,3.6) 1(-2.5,-3.6) 1(2.5,3.6) 1(2.5,-3.6)
  silkscreen extent -4,-4 4,4, body extent -4.1,-4.1 4.1,4.1, height 9.93
Test-point [mil]
  oct 60x60 smd: 1(0,0)
  silkscreen extent -37,-37 37,37
TSOT-23-6 [mm]
  rect 1x0.6 smd: 1(-1.2,0.95) 2(-1.2,0) 3(-1.2,-0.95) 4(1.2,-0.95) 5(1.2,0) 6(1.2,0.95)
  silkscreen extent -1.98,-1.5 0.86,1.5, body extent -1.41,-1.45 1.41,1.45, height 1
TYPE-C-31-M-12_ [mm]
  rect 0.6x1.2 smd: A1/B12(-3.2,2.375) A4/B9(-2.4,2.375) B1/A12(3.2,2.375) B4/A9(2.4,2.375)
  rect 0.3x1.2 smd: A5(-1.25,2.375) A6(-0.25,2.375) A7(0.25,2.375) A8(1.25,2.375) B5(1.75,2.375) B6(0.75,2.375) B7(-0.75,2.375) B8(-1.75,2.375)
  round 0 hole 0.62 unplated: MH(-2.89,1.305) MH(2.89,1.305)
  oval 0.9x2 hole 0.6 slot 1.7 at 90 deg: S1(4.325,1.805) S4(-4.325,1.805)
  oval 0.9x1.7 hole 0.6 slot 1.4 at 90 deg: S2(4.325,-2.375) S3(-4.325,-2.375)
  silkscreen extent -4.5,-3.57 4.5,0.44, body extent -4.47,-5.01 4.47,2.89, height 3.31
UCD-220uF-10mmDia [mm] "0.406\" L x 0.406\" W (10.30mm x 10.30mm)"
  rect 4x2.5 smd: 1(-4,0) 2(4,0)
  silkscreen extent -5.95,-5.21 5.13,5.21, body extent -5.45,-5.15 5.45,5.15, height 10.8
VSON-14(3x4.5) [mm]
  rect 0.6x0.3 smd paste-100 mask+0.051: 1(-1.4,1.95) 2(-1.4,1.3) 3(-1.4,0.65) 4(-1.4,0) 5(-1.4,-0.65) 6(-1.4,-1.3) 7(-1.4,-1.95) 8(1.4,-1.95) 9(1.4,-1.3) 10(1.4,-0.65) 11(1.4,0) 12(1.4,0.65) 13(1.4,1.3) 14(1.4,1.95)
  rect 1.6x4.2 smd paste-100 mask+0.051: 15(0,0)
  silkscreen extent -1.97,-2.29 1.47,2.29, body extent -1.5,-2.25 1.5,2.25, height 1
VSSOP-10 [mm]
  rect 1.45x0.3 smd paste+0 mask+0.05: 1(-2.2,1) 2(-2.2,0.5) 3(-2.2,0) 4(-2.2,-0.5) 5(-2.2,-1) 6(2.2,-1) 7(2.2,-0.5) 8(2.2,0) 9(2.2,0.5) 10(2.2,1)
  silkscreen extent -3.18,-1.55 1.47,1.55, body extent -2.45,-1.5 2.45,1.5, height 1.07
X12ADIWA3DY1027 [mm]
  round 1.5 hole 0.9 paste+0 mask+0.051: 1(3.57,0.38) 2(2.55,2.16) 3(1.53,0.38) 4(0.51,2.16) 5(-0.51,0.38) 6(-1.53,2.16) 7(-2.55,0.38) 8(-3.57,2.16)
  round 0 hole 3.25 unplated paste+0: ""(-6.35,-2.16) ""(6.35,-2.16)
  silkscreen extent -8,-7.16 8,8.04, body extent -7.97,-7.21 8.03,7.99, height 12.94

## Part data
C1 C2 C35 C38: library part CC0402GRNPO9BN300, "CAP CER 30PF 50V C0G/NPO 0402", Case Code (Imperial)=0402, Case Code (Metric)=1005, Dielectric=C0G, LCSC Part Number=C277479, Manufacturer=Yageo, Max Operating Temperature=125°C, Min Operating Temperature=-55°C, Tolerance=2%, Voltage Rating=50V, Case/Package=0402, ComponentLink1Description=https://datasheet.ciiva.com/13263/upy-gp-np0-16v-to-50v-8-3714-13263350.pdf?src-supplier=Mouser, ComponentLink1URL=https://datasheet.ciiva.com/13263/upy-gp-np0-16v-to-50v-8-3714-13263350.pdf?src-supplier=Mouser, Halogen Free=5694HalogenFree, Item Type=Capacitor, Lead Free=5697LeadFree, Length=0.039inch, Manufacturer Part Number=CC0402GRNPO9BN300, Mounting Technology="Surface Mount", Packaging="Tape and Reel", Pricing="1=0.1, 10=0.052, 50=0.0296, 100=0.023, 500=0.01728, 1000=0.01358, 2500=0.01235, 5000=0.01136 (USD)", RoHS=Yes, Series=CC, Stock=114930, Supplier=Digikey, Termination=SMD/SMT, Thickness=0.022inch, Voltage Rating (DC)=50V, Weight=2.3E-05oz, Width=0.02inch
C3 C4: library part CC0402CRNPO9BN6R8, "CAP CER 6.8PF 50V C0G/NPO 0402", Case Code (Imperial)=0402, Case Code (Metric)=1005, Dielectric=C0G, Insulation Resistance=10GR, LCSC Part Number=C189470, Manufacturer=Yageo, Max Operating Temperature=125°C, Min Operating Temperature=-55°C, Supplier Part Number=3247368, Tolerance=2%, Voltage Rating=50V, Case/Package=0402, Category="Ceramic Capacitors", ComponentLink1Description=https://datasheet.ciiva.com/11587/upy-gp-np0-16v-to-50v-8-11587182.pdf?src-supplier=Avnet, ComponentLink1URL=https://datasheet.ciiva.com/11587/upy-gp-np0-16v-to-50v-8-11587182.pdf?src-supplier=Avnet, Construction=Flat, Depth=0.5mm, Height=0.5mm, Item Type=Capacitor, Length=1mm, Manufacturer Part Number=CC0402CRNPO9BN6R8, Mounting Technology="Surface Mount", Packaging="Tape and Reel", Pricing="10000=0.0024, 40000=0.0022, 150000=0.0021, 400000=0.002, 1000000=0.0019 (USD)", Radiation Hardening=No, RoHS=Yes, RoHS Compliant=Yes, Series=CC, Stock=200000, Supplier="Future Electronics", Termination=SMD/SMT, Voltage Rating (DC)=50V, Weight=2.3E-05oz, Width=0.5mm
C5 C6 C8 C16 C36 C37 C39 C40 C41 C42 C43 C45 C47 C48 C49 C50 C51 C52 C53 C64 C65 C68 C69 C78 C79 C80 C83 C84: library part C1005X7R1H104KT000F, "CAP CER 0.1UF 50V X7R 0402", Dielectric=X7R, LCSC Part Number=C361198, Manufacturer=TDK, Tolerance=10%, Voltage=25V, Category="Ceramic Capacitors", ComponentLink1Description=LCSC, ComponentLink1URL=https://www.lcsc.com/product-detail/Multilayer-Ceramic-Capacitors-MLCC-SMD-SMT_TDK-C1005X7R1H104KT000F_C361198.html, Item Type=Capacitor, Manufacturer Part Number=C1005X7R1H104KT000F, RoHS=No, Supplier 1=Avnet, Supplier Part Number 1=C1005X7R1H104KT000F
C7: library part CC0402KRX5R6BB475, "CAP CER 4.7UF 10V X5R 0402", Case Code (Imperial)=0402, Case Code (Metric)=1005, LCSC Part Number=C326586, Manufacturer=Yageo, Max Operating Temperature=85°C, Min Operating Temperature=-55°C, Supplier Part Number 1=3871698, Tolerance=10%, Voltage Rating=10V, Capacitance=4.7uF, Case/Package=0402, Category="Ceramic Capacitors", ComponentLink1Description=http://www.yageo.com/documents/recent/UPY-GPHC_X5R_4V-to-50V_25.pdf?src-supplier=Digi-Key, ComponentLink1URL=http://www.yageo.com/documents/recent/UPY-GPHC_X5R_4V-to-50V_25.pdf?src-supplier=Digi-Key, Manufacturer Part Number=CC0402KRX5R6BB475, Mount="Surface Mount", Packaging="Cut Tape", Pricing 1="10000=0.02310, 50000=0.02100 (GBP)", RoHS=Yes, RoHS Compliant=Yes, Stock 1=20000, Supplier 1=Farnell
C9 C11 C23 C24 C25 C26: library part CC0402JRX7R7BB104, "CAP CER 0.1UF 16V X7R 0402", Case Code (Imperial)=0402, Case Code (Metric)=1005, Dielectric=X7R, LCSC Part Number=C541464, Manufacturer=Yageo, Max Operating Temperature=125°C, Min Operating Temperature=-55°C, Package Quantity=10000, Supplier Part Number=311-1676-1-ND, Tolerance=5%, Voltage Rating=16V, Case/Package=0402, Category="Ceramic Capacitors", ComponentLink1Description=https://datasheet.ciiva.com/13210/upy-gphc-x7r-6-3v-to-50v-8-12304-13210152.pdf?src-supplier=Mouser, ComponentLink1URL=https://datasheet.ciiva.com/13210/upy-gphc-x7r-6-3v-to-50v-8-12304-13210152.pdf?src-supplier=Mouser, Construction=Flat, Halogen Free="Halogen Free", Height=0.5mm, Item Type=Capacitor, Lead Free="Lead Free", Length=0.039inch, Manufacturer Part Number=CC0402JRX7R7BB104, Material=4241ConductorMaterial, Mounting Technology="Surface Mount", Packaging="Tape and Reel", Pricing="1=0.1, 10=0.046, 50=0.0262, 100=0.0203, 500=0.01528, 1000=0.012, 2500=0.01091, 5000=0.01004 (USD)", RoHS=Yes, RoHS Compliant=Yes, Series=CC, Stock=1659111, Supplier=Digikey, Thickness=0.022inch, Voltage Rating (DC)=16V, Width=0.02inch